# Altium PCB Tablet_Design.PcbDoc (part 1 of 6)
Units mil, origin at the board's own origin, x right, y up, seen from the top; angles counter-clockwise.
Board outline 3823 x 4035 mil, 2 copper layers (Top Layer, Bottom Layer), stack 57 mil thick; 254 components, 256 nets, 1099 pads, 445 vias.
Unrouted connection lines stored in the file: 188.
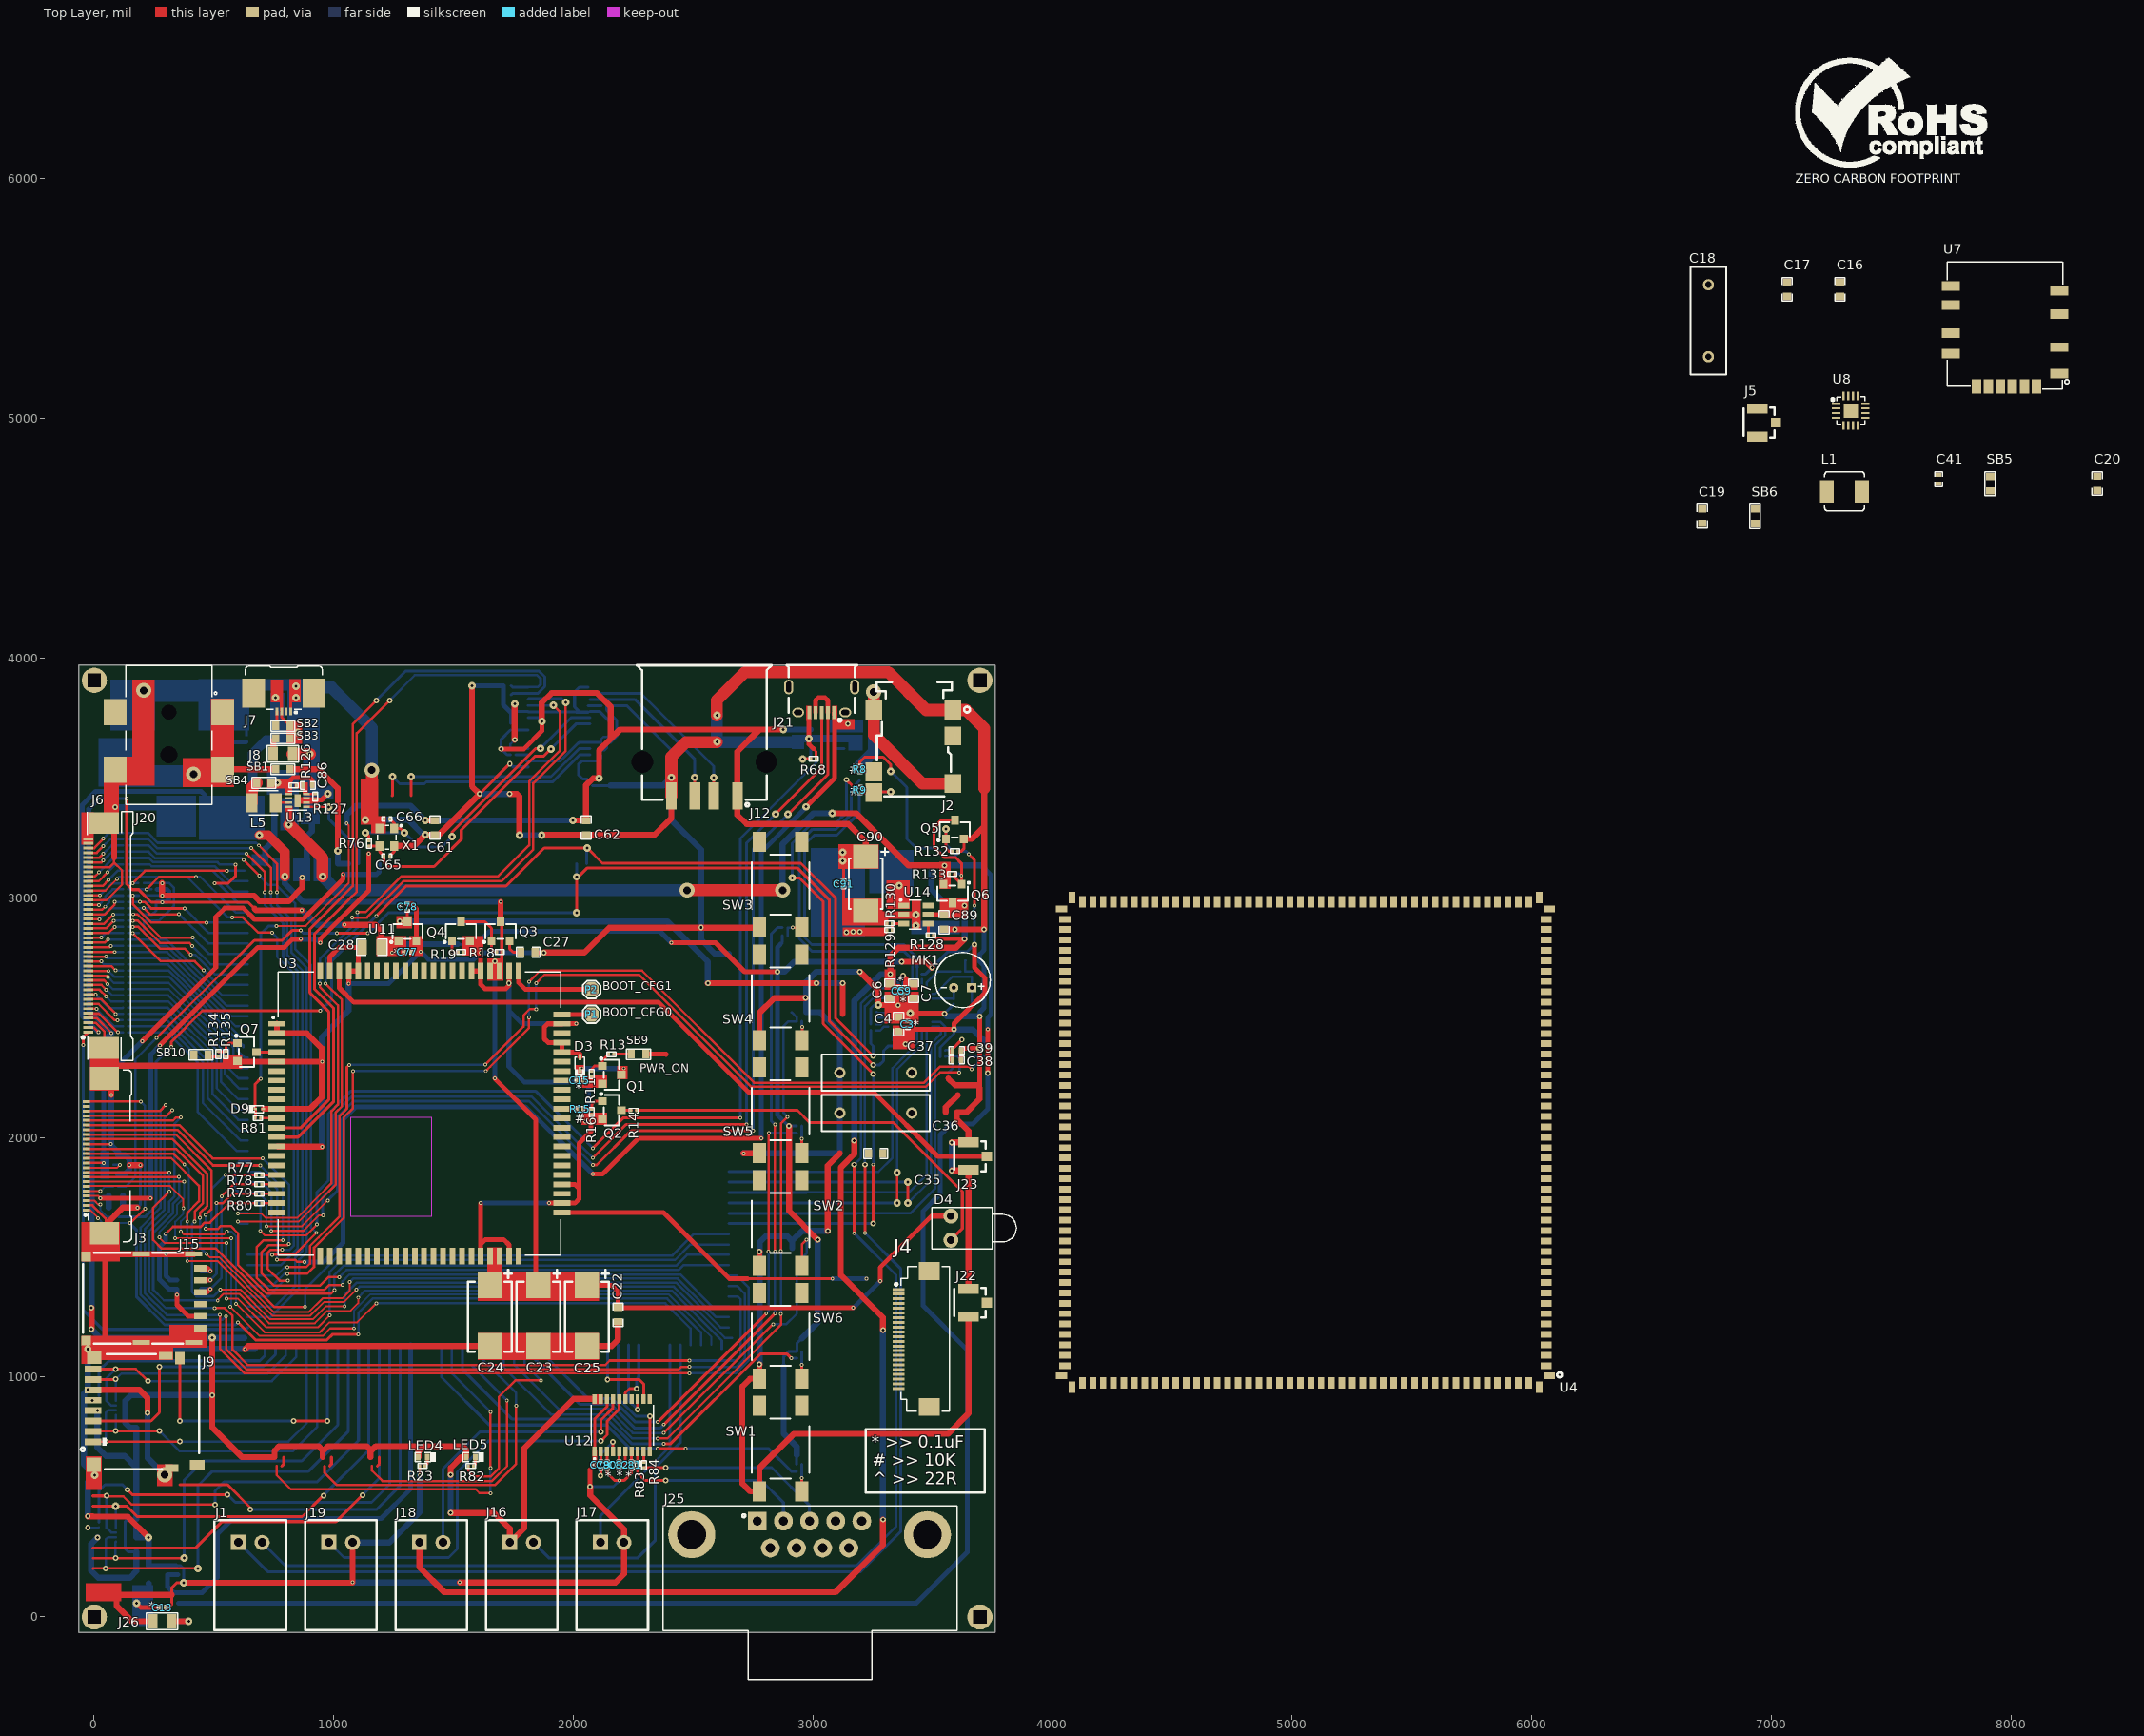
[diagram p0: Top Layer view]
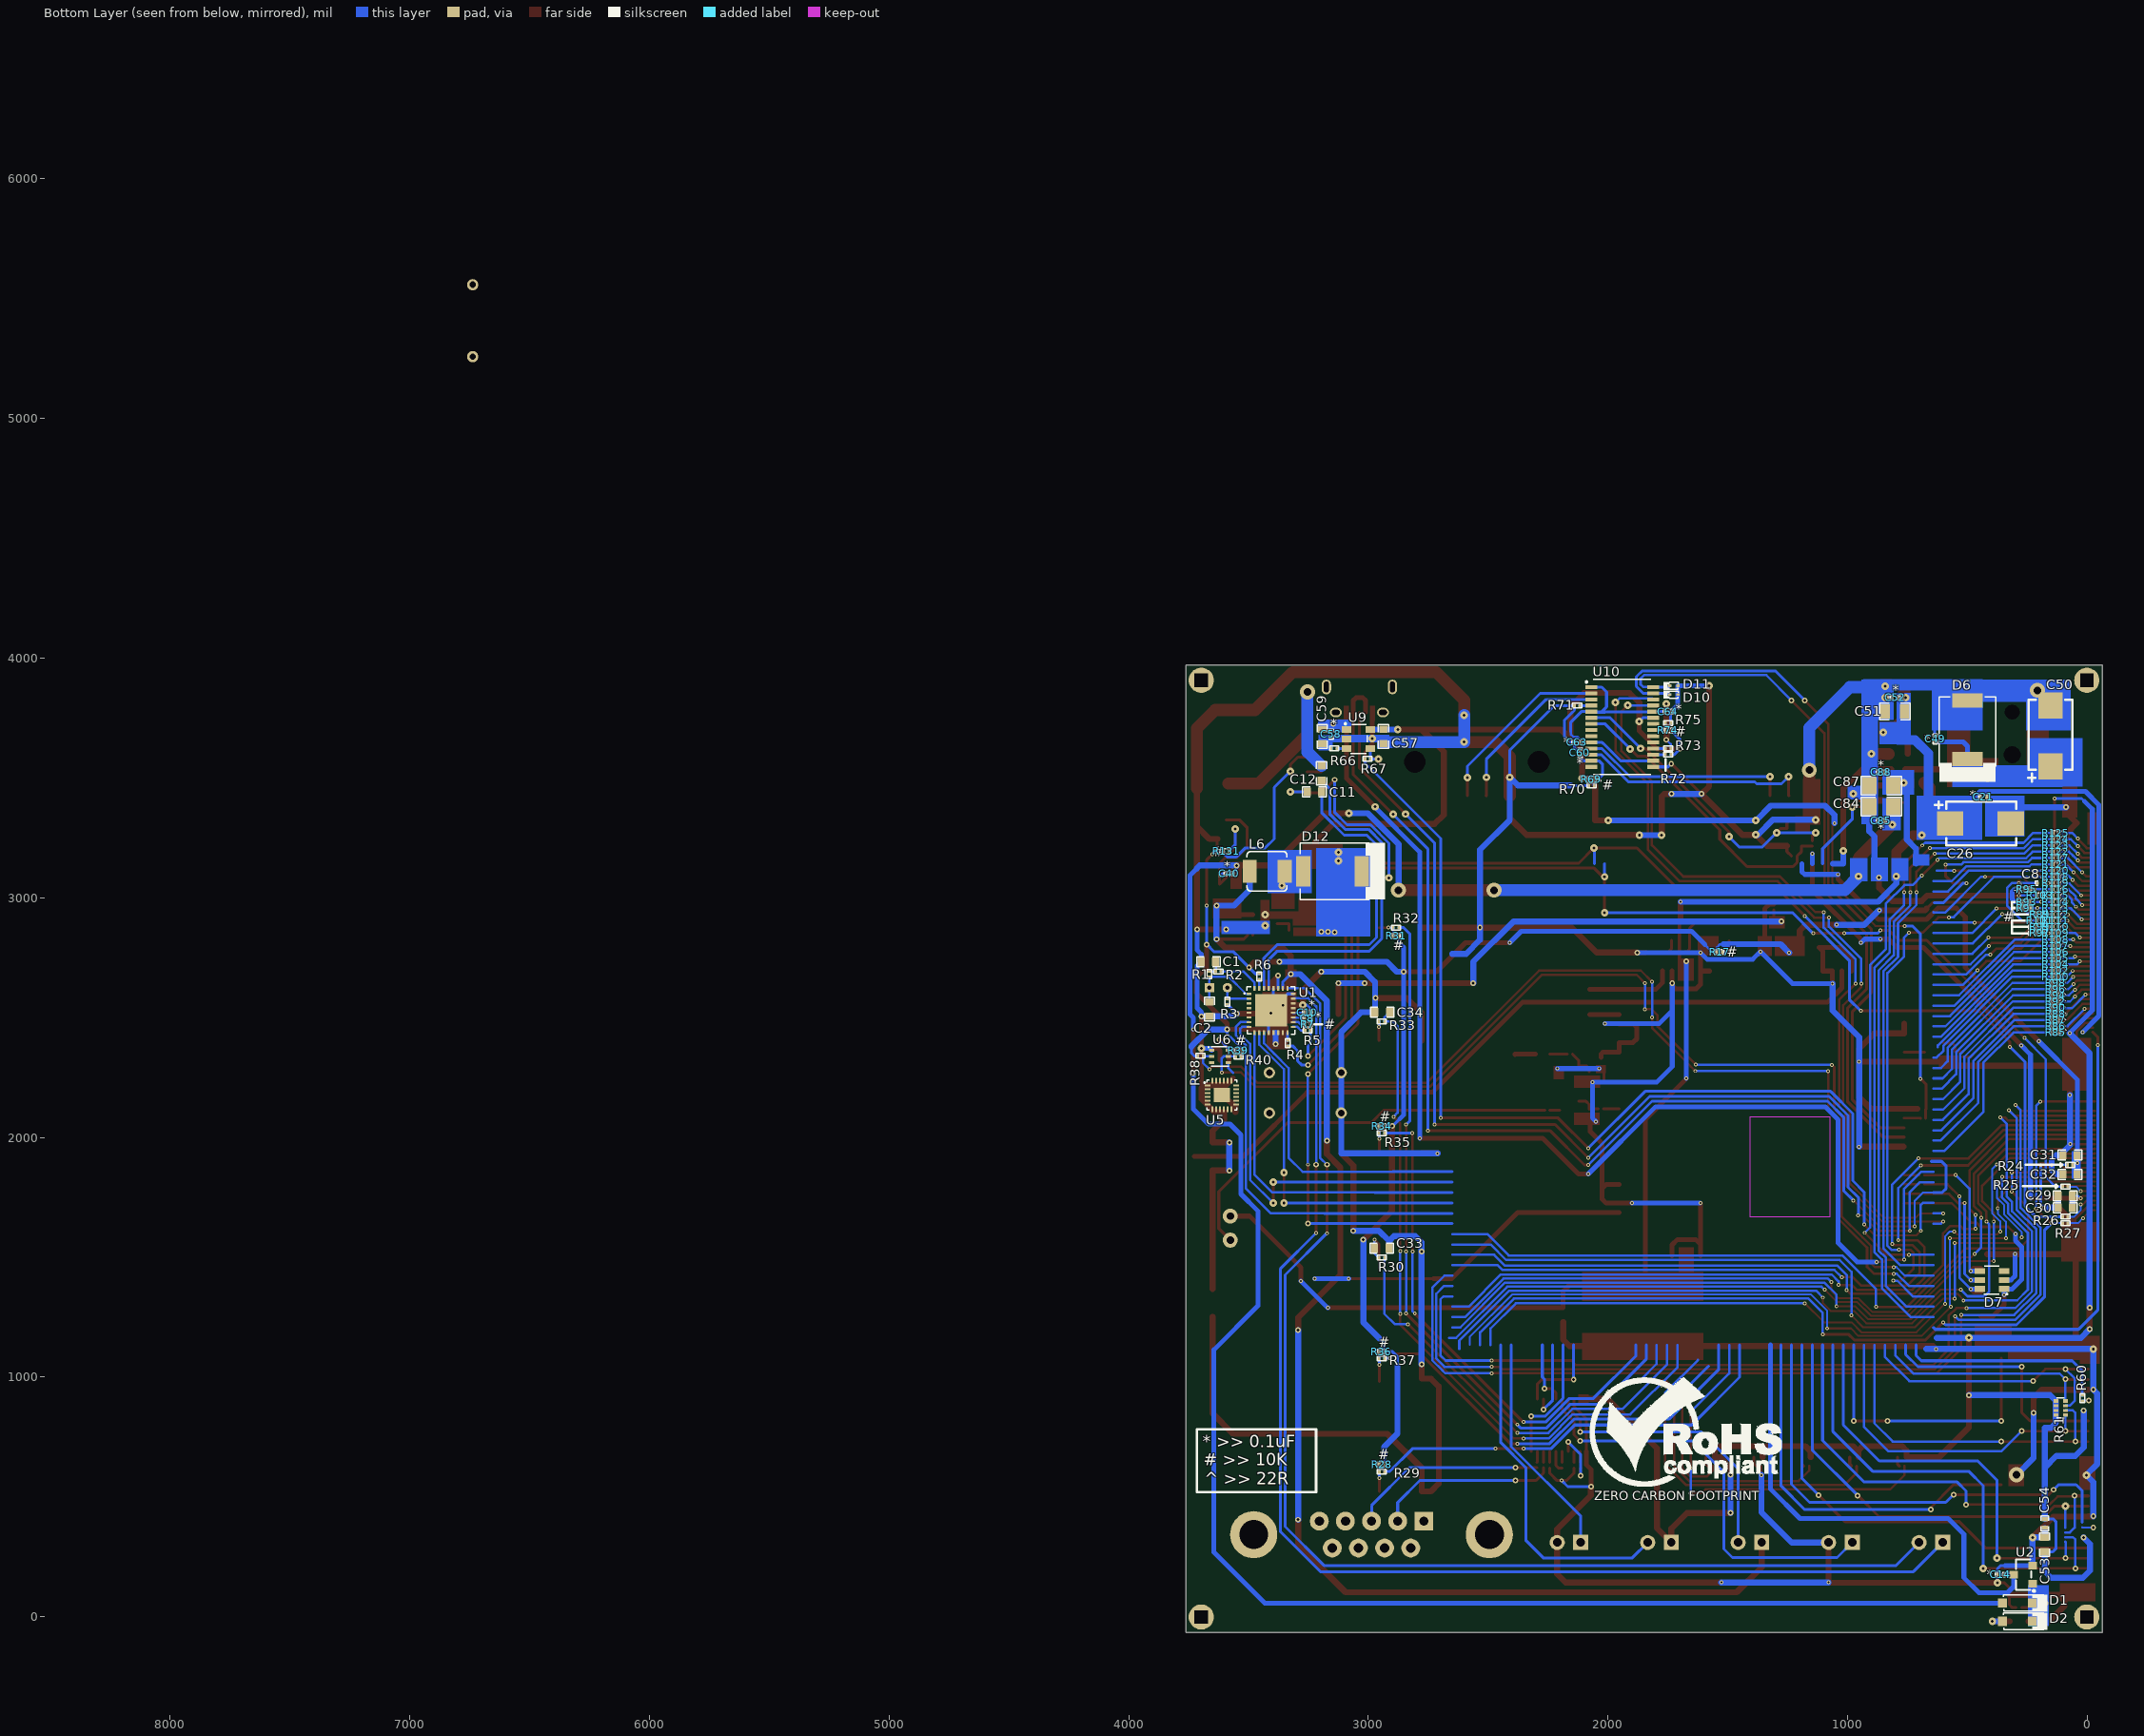
[diagram p1: Bottom Layer view, seen from below]
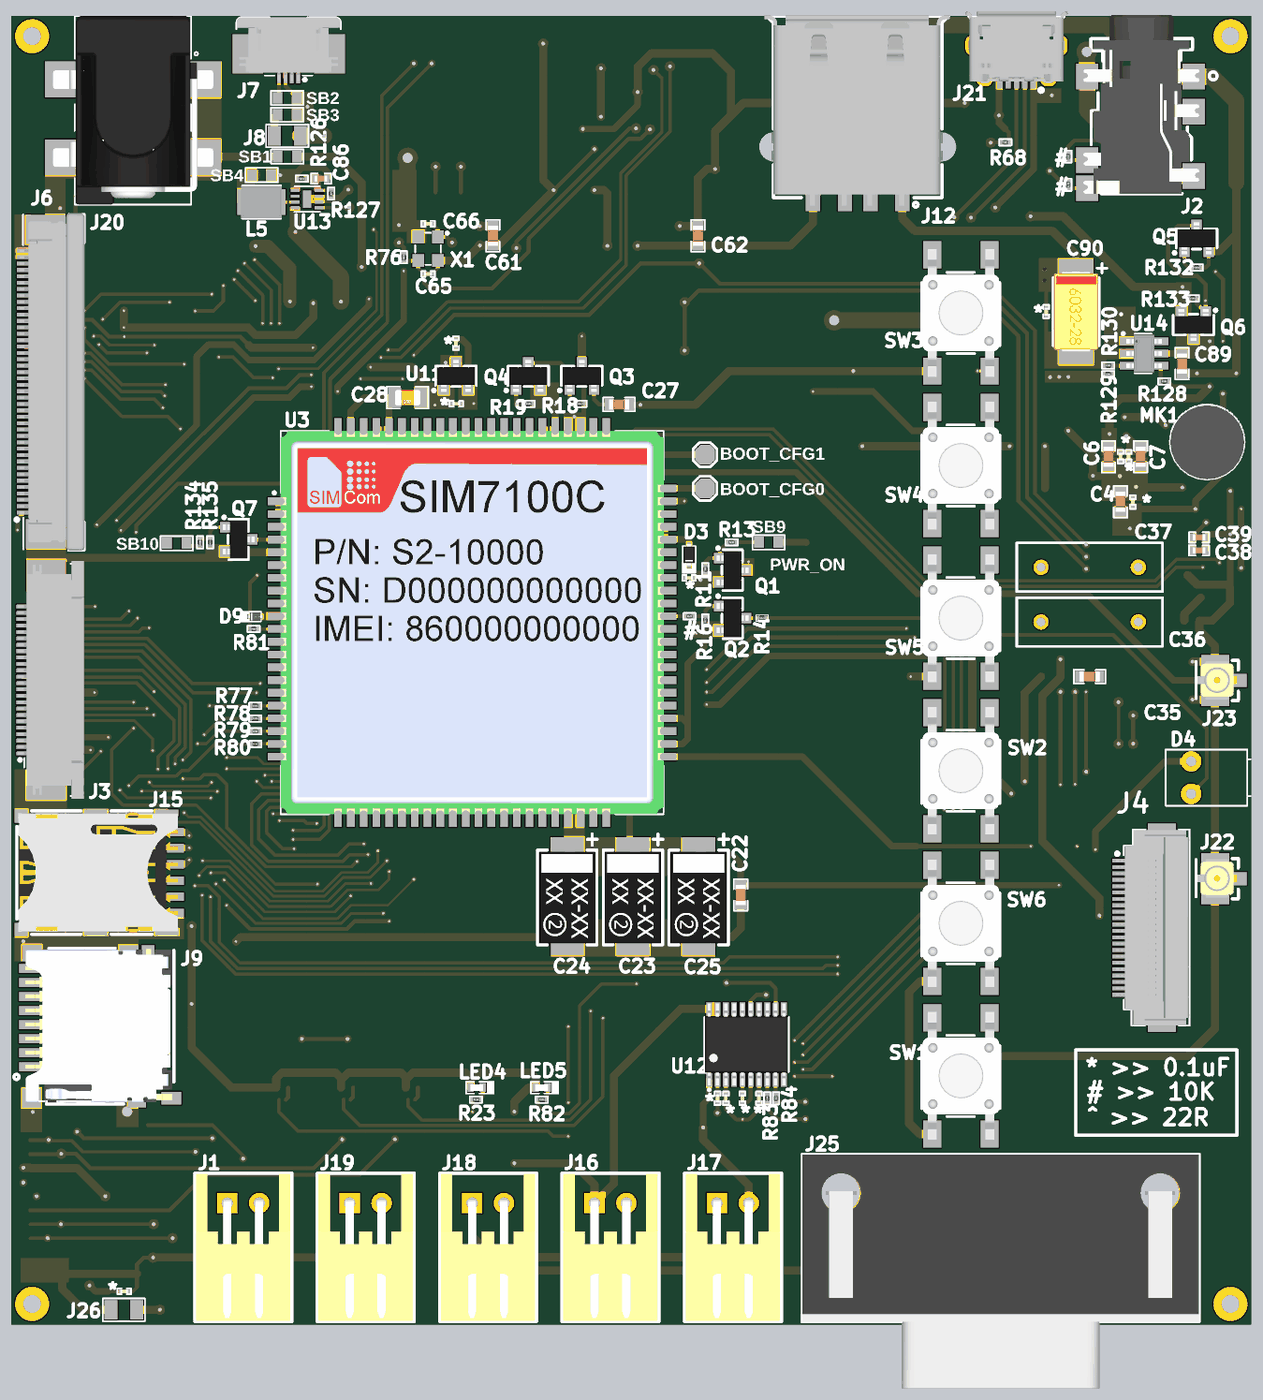
[diagram p4: 3D render of the assembled board from above, using the file's embedded part models]
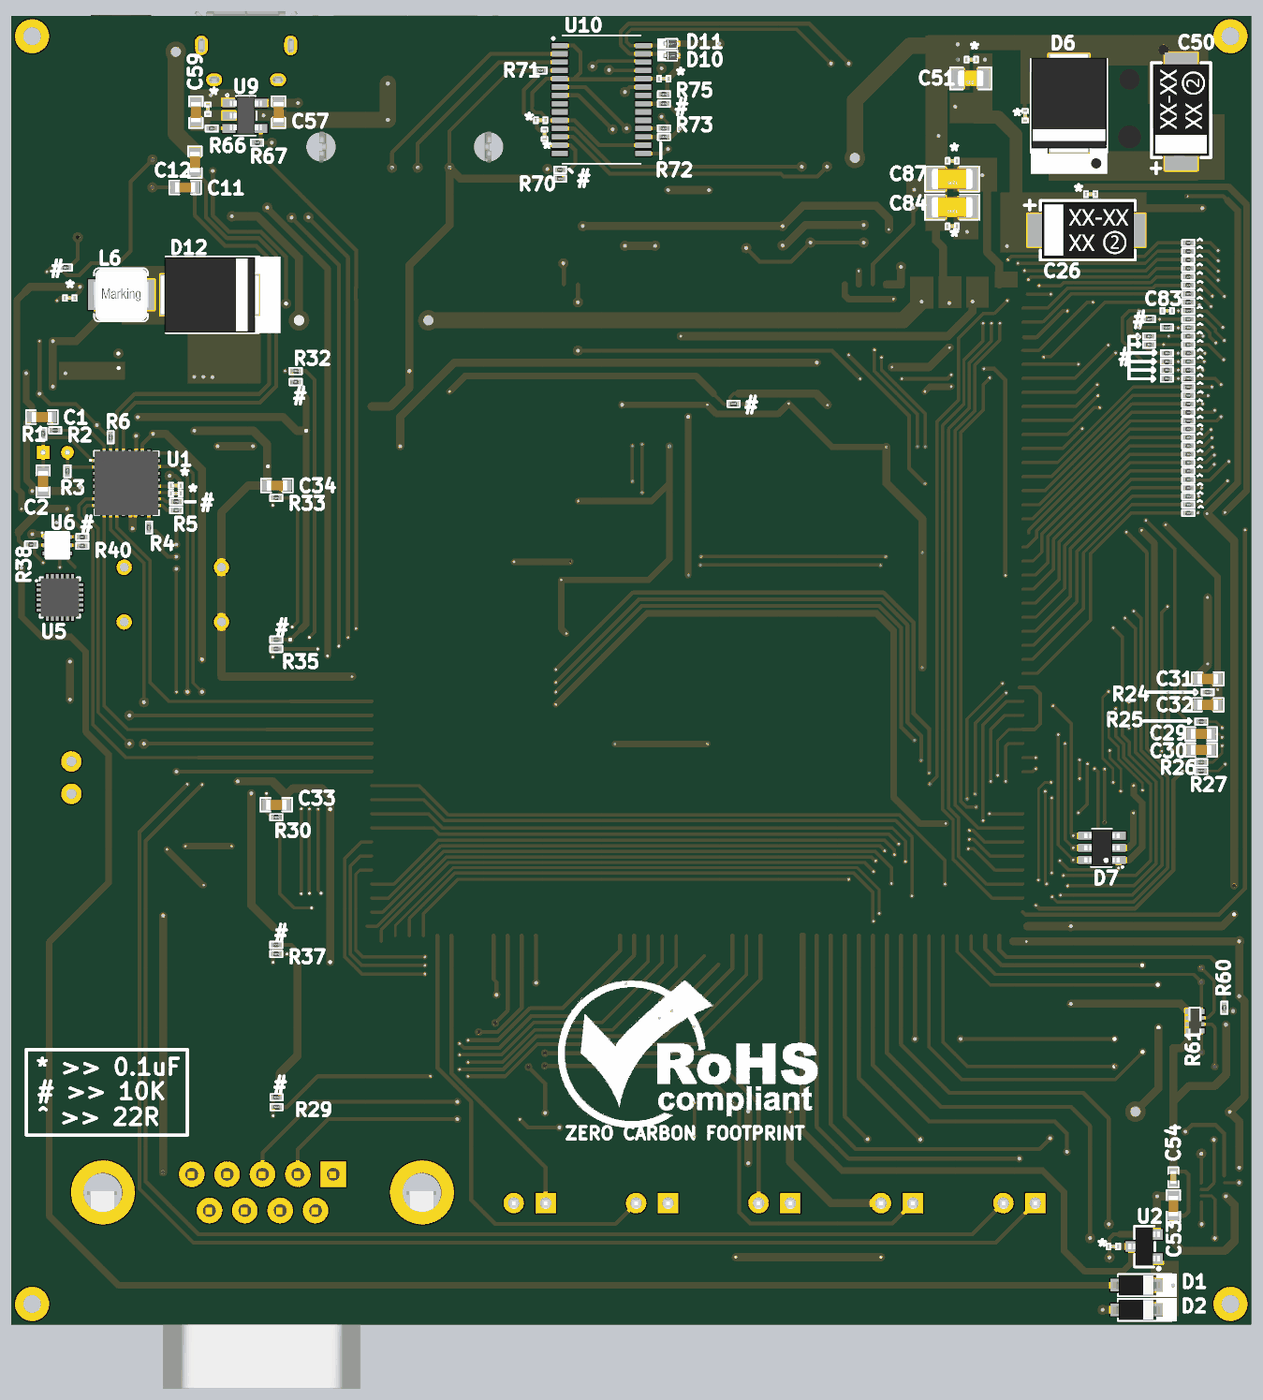
[diagram p5: 3D render of the assembled board from below, using the file's embedded part models]

## Layer stack, top to bottom
Top Solder: solder mask 3, Solder Resist, Dk 3.5
Top Layer: signal copper 10
Dielectric 1: dielectric 37, FR-4, Dk 4.8
Bottom Layer: signal copper 10
Bottom Solder: solder mask 3, Solder Resist, Dk 3.5

## Board outline
-62,-65 3761,-65 3761,3970 -62,3970

## Design rules (kind name [scope] priority, off if disabled: settings)
Clearance [All] p1: gap=7 ignorepadtopadclearanceinfootprint=FALSE except(5: Arc-SMDPad Track-SMDPad SMDPad-SMDPad)
HoleSize [All] p1: absolutevalues=TRUE maxlimit=1000 minlimit=1 maxpercent=80.000 minpercent=20.000
HoleToHoleClearance [All] p1: gap=1 allowstackedmicrovias=TRUE
MinimumSolderMaskSliver [All] p1: minsoldermaskwidth=0
PolygonConnect [All] p1: connectstyle=Relief reliefconductorwidth=10 reliefentries=4 polygonreliefangle="90 Angle" airgapwidth=10
RoutingVias [All] p1: holewidth=7.87 width=15.75 viastyle="Through Hole" minholewidth=7.87 minwidth=15.75 maxholewidth=31.5 maxwidth=62.99
SilkToSilkClearance [All] p1: silktosilkclearance=0
SilkToSolderMaskClearance [IsPad] p1: minsilkscreentomaskgap=0 clearancetoexposedcopper=TRUE
SolderMaskExpansion [All] p1: expansion=4
Width [All] p1: maxlimit=100 minlimit=8 preferedwidth=12 minimp=50.000000 maximp=50.000000 favimp=50.000000
25 further rules are at their usual default settings.

## Classes and differential pairs
component class U_BLE&WiFi_Section: C19 C20 C35 C41 J5 L1 SB5 SB6 U7 U8
component class U_Main_Cont_2: LED5 R82
component class U_USIM_Sec: C21 C22 C23 C24 C25 C26 D7 D9 D10 D11 J15 R77 R78 R79 R80 R81
component class U_USB_OTG: C57 C58 C59 J21 R66 R67 R68 U9
component class U_USB_Host: C60 C61 C62 C63 C64 C65 C66 J12 R69 R70 R71 R72 R73 R74 R75 R76 U10 X1
component class U_USB_Power: C40 C89 C90 C91 D12 L6 Q5 Q6 R128 R129 R130 R131 R132 R133 U14
component class U_Sensor_Section: C18 C36 C37 C38 C39 R38 R39 R40 R48 U5 U6
component class U_RTC_Sec: BT1 C13 C14 D1 D2 J26 U2
component class "U_RS-232 Tranceiver Section": C79 C80 C81 C82 J16 J17 J18 J19 J25 R83 R84 U12
component class U_MIC_Sec: C1 C2 MK1 R1 R2 R3
component class U_Memory_Section: C53 C54 J9 R60 R61
component class U_LCD_Section: C83 J20 R85 R86 R87 R88 R89 R90 R91 R92 R93 R94 R95 R96 R97 R98 R99 R100 R101 R102 R103 R104 R105 R106 R107 R108 R109 R110 R111 R112 R113 R114 R115 R116 R117 R118 R119 R120 R121 R122 R123 R124 R125
component class U_Level_Shifter_Sec: C77 C78 U11
component class U_MCU_Core_Power: C84 C85 C86 C87 C88 L5 R51 R53 R126 R127 SB4 U13
component class U_Main_Cont: C28 J? LED4 R23 R? U4
component class U_Key_Buttons: C33 C34 R28 R29 R30 R31 R32 R33 R34 R35 R36 R37 SW1 SW2 SW3 SW4 SW5 SW6
component class U_Headphones_Sec: C11 C12 J2 R8 R9
component class U_Connector_Section: C49 C50 C51 C52 D6 J6 J7 J8 SB1 SB2 SB3
component class U_Camera_Section: C16 C17 C29 C30 C31 C32 J3 J4 R24 R25 R26 R27
component class U_Audio_Codec_Sec: C3 C4 C5 C6 C7 C8 C9 C10 C? J1 R4 R5 R6 R7 U1
component class U_3G_Modem: C15 C27 D3 D4 J22 J23 P1 P2 Q1 Q2 Q3 Q4 Q7 R11 R13 R14 R15 R16 R17 R18 R19 R134 R135 SB9 SB10 U3

## Components (designator, comment, footprint, x,y, rotation, side; value= is the part's Value field where it differs from the comment)
C1 "4.7uF" Cap0603 3667,2733 r0 bottom locked
C2 "1uF" Cap0603 3663,2535 r270 bottom locked
C3 "0.1uF" "CAP 0201" 3396,2471 r90 top locked
C4 "10uF" Cap0603 3358,2472 r90 top locked
C5 "0.1uF" "CAP 0201" 3358,2611 r270 top locked
C6 "10uF" Cap0603 3321,2611 r270 top locked
C7 "4.7uF" Cap0603 3420,2611 r270 top locked
C8 "0.1uF" "CAP 0201" 3253.87,2497.45 r0 bottom locked
C9 "0.1uF" "CAP 0201" 3383,2611 r270 top locked
C10 "0.1uF" "CAP 0201" 3253.87,2521.79 r0 bottom locked
C11 "4.7uF" Cap0603 3225,3441 r0 bottom locked
C12 "4.7uF" Cap0603 3195,3519 r90 bottom locked
C13 "0.1uF" "CAP 0201" 286,38 r0 top locked
C14 "0.1uF" "CAP 0201" 363,176 r0 bottom locked
C15 "0.1uF" "CAP 0201" 2028,2237 r0 top locked
C16 "1uF" Cap0603 7286,5538 r90 top
C17 "10uF" Cap0603 7066,5538 r90 top
C18 "Cap" RAD-0.3 6737,5407 r90 top value=0.1uF
C19 "1.2pF" Cap0603 6711,4592 r90 top
C20 "1.2pF" Cap0603 8359,4728 r90 top
C21 "0.1uF" "CAP 0201" 433,3420 r180 bottom locked
C22 "1uF" Cap0603 2187,1260 r270 top locked
C23 "100uF" 593D107X9016D2TE3 1854.71,1256.23 r270 top locked
C24 "100uF" 593D107X9016D2TE3 1652,1256.23 r270 top locked
C25 "100uF" 593D107X9016D2TE3 2057.42,1256.23 r270 top locked
C26 "100uF" 593D107X9016D2TE3 446,3309 r180 bottom locked
C27 "10uF" Cap0603 1812,2772 r180 top locked
C28 "22UF" Cap0805 1160,2793.04 r180 top locked
C29 "1uF" Cap0603 92,1756 r0 bottom locked
C30 "10uF" Cap0603 92,1707 r0 bottom locked
C31 "1uF" Cap0603 72,1926 r0 bottom locked
C32 "10uF" Cap0603 72,1846 r0 bottom locked
C33 "1uF" Cap0603 2944,1538 r0 bottom locked
C34 "1uF" Cap0603 2942,2522 r180 bottom locked
C35 "10uF" Cap0603 3263,1933 r0 top locked
C36 "Cap" RAD-0.3 3263,2101.5 r0 top locked value=0.1uF
C37 "Cap" RAD-0.3 3263,2270 r0 top locked value=0.1uF
C38 "100pF" Cap0402 3600.24,2322 r180 top locked
C39 "100pF" Cap0402 3600.24,2362 r180 top locked
C40 "0.1uF" "CAP 0201" 3581,3100 r180 bottom locked
C41 "10nF" Cap0402 7697,4746 r90 top
C49 "0.1uF" "CAP 0201" 635,3662 r90 bottom locked
C50 "100uF" 593D107X9016D2TE3 154,3675 r90 bottom locked
C51 "22UF" Cap0805 802.84,3777.11 r0 bottom locked
C52 "0.1uF" "CAP 0201" 801,3835 r0 bottom locked
C53 "10uF" Cap0603 178,301 r90 bottom locked
C54 "100pF" Cap0402 178,389 r270 bottom locked
C57 "10uF" Cap0603 2937,3673 r270 bottom locked
C58 "0.1uF" "CAP 0201" 3155,3682 r270 bottom locked
C59 "10uF" Cap0603 3192,3673 r270 bottom locked
C60 "0.1uF" "CAP 0201" 2117,3605 r90 bottom locked
C61 "10uF" Cap0603 1423,3292 r270 top locked
C62 "10uF" Cap0603 2055,3292 r270 top locked
C63 "0.1uF" "CAP 0201" 2129,3648 r0 bottom locked
C64 "0.1uF" "CAP 0201" 1749,3775.98 r180 bottom locked
C65 "18pF" "CAP 0201" 1223,3174 r180 top locked
C66 "18pF" "CAP 0201" 1223,3329 r0 top locked
C77 "0.1uF" "CAP 0201" 1310,2774 r0 top locked
C78 "0.1uF" "CAP 0201" 1309,2961 r90 top locked
C79 "0.1uF" "CAP 0201" 2115.43,633 r90 top locked
C80 "0.1uF" "CAP 0201" 2141.19,633 r270 top locked
C81 "0.1uF" "CAP 0201" 2243.39,633 r270 top locked
C82 "0.1uF" "CAP 0201" 2192.2,633 r90 top locked
C83 "10pF" "CAP 0201" 197,3061 r0 bottom locked
C84 "47uF" Cap1206 860,3380 r0 bottom locked
C85 "0.1uF" "CAP 0201" 860,3321 r0 bottom locked
C86 "22pF" Cap0402 893,3468 r180 top locked
C87 "47uF" Cap1206 860,3467 r0 bottom locked
C88 "0.1uF" "CAP 0201" 860,3523 r0 bottom locked
C89 "10uF" Cap0603 3548,2898 r270 top locked
C90 "22uF" T491C226K025AT 3221,3058 r270 top locked
C91 "0.1uF" "CAP 0201" 3129,3058 r270 top locked
D1 "1N4148W-7-F" SOD-123 292,57 r180 bottom locked
D2 "1N4148W-7-F" SOD-123 292,-19 r180 bottom locked
D3 "ESDA18-1K" SOD-523 2028,2308 r90 top locked
D4 "LED1" LED-1 3576,1621.48 r0 top locked
D6 "SS34-E3/57T" SMC 500,3700.76 r90 bottom locked
D7 "ESDA6V1-5SC6" SOT-23-6 398,1405 r0 bottom locked
D9 "ESD9L5.0ST5G" SOD-923 690,2118 r0 top locked
D10 "ESD9L5.0ST5G" SOD-923 1725,3847 r180 bottom locked
D11 "ESD9L5.0ST5G" SOD-923 1725,3884 r180 bottom locked
D12 "SS34-E3/57T" SMC 3149,3110 r0 bottom locked
J1 "S2B-XH-A(LF)(SN)" S2B-XH-A(LF)(SN) 653,310 r0 top locked
J2 "SJ-43504-SMT-TR" SJ-43504-SMT-TR 3419.63,3610.76 r0 top locked
J3 "0524352471" 0524352471 6.94,1923 r90 top locked
J4 "TF31-22S-0.5SH(800)" TF31-22S-0.5SH(800) 3422,1159 r270 top
J5 "U.FL-R-SMT-1(80)" U.FL-R-SMT-1(80) 6982,4982 r90 top
J6 "DC-005-5A-2.5-SMT" DC-005-5A-2.5-SMT 313,3774 r270 top locked value=Custom
J7 "0527460471" 0527460471 793,3815 r180 top locked
J8 "SMD PADS" "SMD PAD" 789,3600 r0 top locked
J9 "114-00841-68" 114-00841-68 214,855 r270 top locked
J12 "87583-2010BLF" 87583-2010BLF 2547.66,3495.53 r180 top locked
J15 "693043020611" 693043020611 205,1329 r270 top locked
J16 "S2B-XH-A(LF)(SN)" S2B-XH-A(LF)(SN) 1785.24,310 r0 top locked
J17 "S2B-XH-A(LF)(SN)" S2B-XH-A(LF)(SN) 2162.65,310 r0 top locked
J18 "S2B-XH-A(LF)(SN)" S2B-XH-A(LF)(SN) 1407.83,310 r0 top locked
J19 "S2B-XH-A(LF)(SN)" S2B-XH-A(LF)(SN) 1030.41,310 r0 top locked
J20 "4-1734592-2" 4-1734592-2 -23,2438.71 r90 top locked
J21 "10118194-0001LF" 10118194-0001LF 3037.2,3772.7 r180 top locked
J22 "U.FL-R-SMT-1(80)" U.FL-R-SMT-1(80) 3690,1310 r90 top locked
J23 "U.FL-R-SMT-1(80)" U.FL-R-SMT-1(80) 3690,1921 r90 top locked
J25 "A-DF 09 A/KG-T4S" "A-DF 09 A/KG-T4S" 2986.58,342.91 r0 top locked
J26 "SMD PADS" "SMD PAD" 285,-19 r180 top locked
L1 "2.2uH" 74437324022 7304,4695 r0 top
L5 "1uH" LQH32PN1R0NNCL 709,3396 r180 top locked
L6 "2.2uH" 74437324022 3422,3110 r0 bottom locked
LED4 "LED Blue" "LED 0402" 1373,666 r0 top locked
LED5 "LED Blue" "LED 0402" 1573,666 r0 top locked
MK1 "POM-2738P-R" POM-2738P-R 3625.4,2624.31 r180 top locked
P1 "Test Point" "TEST POINT" 2077,2513 r0 top locked
P2 "Test Point" "TEST POINT" 2077,2617 r0 top locked
Q1 "MMBT3904" SOT-23 2162,2261 r270 top locked
Q2 "MMBT3904" SOT-23 2162,2113 r270 top locked
Q3 "CJ2305" SOT-23 1697,2860 r0 top locked value=Custom
Q4 "MMBT3904" SOT-23 1532,2860 r0 top locked
Q5 "MMBT3904" SOT-23 3592.67,3284 r0 top locked
Q6 "CJ2305" SOT-23 3583,3017 r180 top locked value=Custom
Q7 "MMBT3904" SOT-23 639,2356 r270 top locked
R1 "680R" Res-0201#1 3663,2681.31 r90 bottom locked
R2 "5.6K" Res-0201#1 3626,2692.31 r0 bottom locked
R3 "680R" Res-0201#1 3588,2566 r270 bottom locked
R4 "100R" Res-0201#1 3336.69,2392.83 r90 bottom locked
R5 "100R" Res-0201#1 3252.87,2445.79 r0 bottom locked
R6 "0R" Res-0201#1 3454.87,2670.79 r90 bottom locked
R7 "10K" Res-0201#1 3252.87,2472.12 r0 bottom locked
R8 "10K" Res-0201#1 3197,3536 r90 top locked
R9 "10K" Res-0201#1 3197,3449 r90 top locked
R11 "47K" Res-0201#1 2078,2264 r270 top locked
R13 "4.7K" Res-0201#1 2159,2347 r0 top locked
R14 "300R" Res-0201#2 2253,2113 r0 top locked
R15 "10K" Res-0201#1 2029,2119 r180 top locked
R16 "47K" Res-0201#1 2078,2106 r270 top locked
R17 "10K" Res-0201#1 1534,2774 r0 bottom
R18 "100K" Res-0201#1 1693,2774 r0 top locked
R19 "5.1K" Res-0201#1 1533,2774 r0 top locked
R23 "470R" Res-0201#1 1370.83,629 r0 top locked
R24 "0R" Res-0201#1 72,1885 r180 bottom locked
R25 "100R" Res-0201#1 92,1794.05 r0 bottom locked
R26 "100R" Res-0201#1 92,1669 r0 bottom locked
R27 "33R" Res-0201#1 92,1642 r0 bottom locked
R28 "10K" Res-0201#1 2943.17,636 r180 bottom locked
R29 "100R" Res-0201#1 2943.17,606 r180 bottom locked
R30 "100R" Res-0201#1 2944,1499 r180 bottom locked
R31 "10K" Res-0201#1 2884,2841 r180 bottom locked
R32 "100R" Res-0201#1 2884,2875 r180 bottom locked
R33 "100R" Res-0201#1 2944,2484 r180 bottom locked
R34 "10K" Res-0201#1 2943.83,2047 r180 bottom locked
R35 "100R" Res-0201#1 2943.83,2018 r180 bottom locked
R36 "10K" Res-0201#1 2944.17,1106 r180 bottom locked
R37 "100R" Res-0201#1 2944,1078 r180 bottom locked
R38 "2.2K" Res-0201#1 3700.24,2340 r0 bottom locked
R39 "10K" Res-0201#1 3542.24,2363 r180 bottom locked
R40 "2.2K" Res-0201#1 3542.24,2336 r180 bottom locked
R60 "100R" Res-0201#1 21,912 r270 bottom locked
R61 "47K" CAY10-473J4LF 131.37,900.68 r180 bottom locked
R66 "6.8K" Res-0201#1 3143,3623 r0 bottom locked
R67 "1K" Res-0201#1 3003,3579 r0 bottom locked
R68 "100K" Res-0201#1 3003,3580 r0 top locked
R69 "10K" Res-0201#1 2068.83,3495 r180 bottom locked
R70 "47K" Res-0201#1 2068.83,3468 r180 bottom locked
R71 "680R" Res-0201#1 2129,3801.57 r180 bottom locked
R72 "510K" Res-0201#1 1749,3596.67 r180 bottom locked
R73 "100K" Res-0201#1 1749,3623 r180 bottom locked
R74 "10K" Res-0201#1 1749,3699.2 r180 bottom locked
R75 "20K" Res-0201#1 1749,3728 r180 bottom locked
R76 "1.1M" Res-0201#1 1148,3226 r270 top locked
R77 "50R" Res-0201#1 690,1843 r0 top locked
R78 "50R" Res-0201#1 690,1804 r0 top locked
R79 "50R" Res-0201#1 690,1764.5 r0 top locked
R80 "50R" Res-0201#1 690,1725 r0 top locked
R81 "0R" Res-0201#1 685,2080 r180 top locked
R82 "470R" Res-0201#1 1573.25,629 r0 top locked
R83 "100R" Res-0201#1 2269,633 r90 top locked
R84 "100R" Res-0201#1 2296,633 r270 top locked
R85 "22R" Res-0201#1 132,2437.14 r0 bottom locked
R86 "22R" Res-0201#1 132,2463.06 r0 bottom locked
R87 "22R" Res-0201#1 132,2488.98 r0 bottom locked
R88 "22R" Res-0201#1 132,2514.91 r0 bottom locked
R89 "10K" Res-0201#1 198,2930 r0 bottom locked
R90 "22R" Res-0201#1 132,2540.83 r0 bottom locked
R91 "10K" Res-0201#1 253,2956 r0 bottom locked
R92 "22R" Res-0201#1 132,2566.76 r0 bottom locked
R93 "10K" Res-0201#1 253,2982 r0 bottom locked
R94 "22R" Res-0201#1 132,2592.68 r0 bottom locked
R95 "10K" Res-0201#1 253,3035 r0 bottom locked
R96 "22R" Res-0201#1 132,2618.56 r0 bottom locked
R97 "10K" Res-0201#1 198,2852 r0 bottom locked
R98 "22R" Res-0201#1 132,2644.43 r0 bottom locked
R99 "10K" Res-0201#1 198,2878 r0 bottom locked
R100 "22R" Res-0201#1 132,2670.31 r0 bottom locked
R101 "10K" Res-0201#1 198,2904 r0 bottom locked
R102 "22R" Res-0201#1 132,2696.18 r0 bottom locked
R103 "10K" Res-0201#1 198,3009 r0 bottom locked
R104 "22R" Res-0201#1 132,2721.74 r0 bottom locked
R105 "22R" Res-0201#1 132,2747.3 r0 bottom locked
R106 "22R" Res-0201#1 132,2773.43 r0 bottom locked
R107 "22R" Res-0201#1 132,2799.57 r0 bottom locked
R108 "22R" Res-0201#1 132,2825.7 r0 bottom locked
R109 "22R" Res-0201#1 132,2851.84 r0 bottom locked
R110 "22R" Res-0201#1 132,2877.97 r0 bottom locked
R111 "22R" Res-0201#1 132,2904.11 r0 bottom locked
R112 "22R" Res-0201#1 132,2930.24 r0 bottom locked
R113 "22R" Res-0201#1 132,2956.38 r0 bottom locked
R114 "22R" Res-0201#1 132,2982.51 r0 bottom locked
R115 "22R" Res-0201#1 132,3008.65 r0 bottom locked
R116 "22R" Res-0201#1 132,3034.78 r0 bottom locked
R117 "100R" Res-0201#1 132,3165.46 r0 bottom locked
R118 "22R" Res-0201#1 132,3087.05 r0 bottom locked
R119 "100R" Res-0201#1 132,3060.92 r0 bottom locked
R120 "22R" Res-0201#1 132,3113.19 r0 bottom locked
R121 "22R" Res-0201#1 132,3139.32 r0 bottom locked
R122 "22R" Res-0201#1 132,3191.59 r0 bottom locked
R123 "22R" Res-0201#1 132,3217.73 r0 bottom locked
R124 "22R" Res-0201#1 132,3243.86 r0 bottom locked
R125 "22R" Res-0201#1 132,3270 r0 bottom locked
R126 "402K" Res-0201#1 833.83,3468 r180 top locked
R127 "270K" Res-0201#1 924,3422 r270 top locked
R128 "100K" Res-0201#1 3493,2843 r0 top locked
R129 "536K" Res-0201#1 3320,2865 r0 top locked
R130 "100K" Res-0201#1 3320,2892 r0 top locked
R131 "10K" Res-0201#1 3592.83,3193.83 r0 bottom locked
R132 "5.1K" Res-0201#1 3592.83,3194 r0 top locked
R133 "100K" Res-0201#1 3581,3099 r180 top locked
R134 "4.7K" Res-0201#1 520,2347 r270 top locked
R135 "47K" Res-0201#1 551,2347 r270 top locked
SB1 "Solder Bridge" "Solder Bridge" 789,3536 r180 top locked
SB2 "Solder Bridge" "Solder Bridge" 789,3717 r180 top locked
SB3 "Solder Bridge" "Solder Bridge" 789,3665 r180 top locked
SB4 "Solder Bridge" "Solder Bridge" 710,3479 r0 top locked
SB5 "Solder Bridge" "Solder Bridge" 7913,4727 r90 top
SB6 "Solder Bridge" "Solder Bridge" 6932,4591 r90 top
SB9 "Solder Bridge" "Solder Bridge" 2273,2347 r180 top locked
SB10 "Solder Bridge" "Solder Bridge" 448,2344 r0 top locked
SW1 "Tactile Switch" TL3301NF160QG/TR 2866,702 r90 top locked value=Custom
SW2 "Tactile Switch" TL3301NF160QG/TR 2866,1642.8 r90 top locked value=Custom
SW3 "Tactile Switch" TL3301NF160QG/TR 2866,3054 r90 top locked value=Custom
SW4 "Tactile Switch" TL3301NF160QG/TR 2866,2583.6 r90 top locked value=Custom
SW5 "Tactile Switch" TL3301NF160QG/TR 2866,2113.2 r90 top locked value=Custom
SW6 "Tactile Switch" TL3301NF160QG/TR 2866,1172.4 r90 top locked value=Custom
U1 "ALC5621" 32-QFN 3405.87,2529.79 r180 bottom locked value=Custom
U2 "S-1206B18-M3T1U" SOT-23 268,176 r90 bottom locked
U3 "SIM7100AS2-10671" SIM7100AS2-10671 1358.8,2099.51 r0 top locked
U4 "S5P4418" S5P4418 5056,1979 r180 top value=Custom
U5 "ICM-20948" "24-QFN (3x3)" 3611.31,2177 r180 bottom locked
U6 "VEML6030-GS15" 6-SMD 3619.24,2338 r180 bottom locked
U7 "F23BUUM13-W2" F23BUUM13-W2 7749,5551.74 r0 top
U8 "PCA9534BS3,118" 16HVQFN 7330.98,5031.47 r0 top
U9 "SY6280AAC" SOT23-5 3041,3662 r180 bottom locked value=Custom
U10 "GL850G" SSOP-28 1941,3712 r180 bottom locked
U11 "S-1206B18-M3T1U" SOT-23 1309,2860 r0 top locked
U12 "SP3222EEY-L/TR" 20-TSSOP 2205,799 r90 top locked
U13 "ETA3451D2I-T" QFN-8 850,3405 r180 top locked value=Custom
U14 "MP3221GJ-Z" TSOT-23-6 3431,2929 r0 top locked
X1 "8Z-12.000MAAJ-T" 8Z-12.000MAAJ-T 1223,3252 r270 top locked

## Footprints (in the part's own frame and the unit in brackets; to place one, negate y for a bottom-side part, rotate by r counter-clockwise, add the part's x,y. Pads: shape width x height; smd on the part's side, far side on the other; paste and mask are expansions set on the pad)
4-1734592-2 [mm] "CONN FPC BOTTOM 42POS 0.50MM R/A"
  rect 0.3x1.1 smd: 1(0,0) 2(0.5,0) 3(1,0) 4(1.5,0) 5(2,0) 6(2.5,0) 7(3,0) 8(3.5,0) 9(4,0) 10(4.5,0) 11(5,0) 12(5.5,0) 13(6,0) 14(6.5,0) 15(7,0) 16(7.5,0) 17(8,0) 18(8.5,0) 19(9,0) 20(9.5,0) 21(10,0) 22(10.5,0) 23(11,0) 24(11.5,0) 25(12,0) 26(12.5,0) 27(13,0) 28(13.5,0) 29(14,0) 30(14.5,0) 31(15,0) 32(15.5,0) 33(16,0) 34(16.5,0) 35(17,0) 36(17.5,0) 37(18,0) 38(18.5,0) 39(19,0) 40(19.5,0) 41(20,0) 42(20.5,0)
  rect 2.3x3.1 smd: MP1(-1.67,-1.7) MP2(22.17,-1.7)
  silkscreen extent -3,-4.75 23.39,0.69, body extent -2.98,-4.76 23.45,0.35, height 2.05
6-SMD [mm]
  rect 0.55x0.3 smd: 1(-0.875,0.65) 2(-0.875,0) 3(-0.875,-0.65) 4(0.875,-0.65) 5(0.875,0) 6(0.875,0.65)
  silkscreen extent -1.23,-1.04 0.91,1.04, body extent -1,-1 1,1, height 0.83
8Z-12.000MAAJ-T [mm]
  rect 1x0.9 smd: 1(-0.925,0.775) 2(0.925,0.775) 3(0.925,-0.775) 4(-0.925,-0.775)
  silkscreen extent -1.29,-1 1.25,1.57
16HVQFN [mm] "IC I/O EXPANDER I2C 8B 16HVQFN"
  rect 0.9x0.24 smd: 1(-1.55,0.75) 2(-1.55,0.25) 3(-1.55,-0.25) 4(-1.55,-0.75) 9(1.55,-0.75) 10(1.55,-0.25) 11(1.55,0.25) 12(1.55,0.75)
  rect 0.24x0.9 smd: 5(-0.75,-1.55) 6(-0.25,-1.55) 7(0.25,-1.55) 8(0.75,-1.55) 13(0.75,1.55) 14(0.25,1.55) 15(-0.25,1.55) 16(-0.75,1.55)
  rect 1.5x1.5 smd: 17(0,0)
  silkscreen extent -2.04,-1.5 1.5,1.5, body extent -1.5,-1.5 1.5,1.5, height 0.9
20-TSSOP [mm]
  rect 1.05x0.45 smd: 1(-2.775,2.925) 2(-2.775,2.275) 3(-2.775,1.625) 4(-2.775,0.975) 5(-2.775,0.325) 6(-2.775,-0.325) 7(-2.775,-0.975) 8(-2.775,-1.625) 9(-2.775,-2.275) 10(-2.775,-2.925) 11(2.775,-2.925) 12(2.775,-2.275) 13(2.775,-1.625) 14(2.775,-0.975) 15(2.775,-0.325) 16(2.775,0.325) 17(2.775,0.975) 18(2.775,1.625) 19(2.775,2.275) 20(2.775,2.925)
  silkscreen extent -3.61,-3.3 2.16,3.3, body extent -3.2,-3.25 3.2,3.25, height 1.2
"24-QFN (3x3)" [mm]
  rect 0.62x0.22 smd: 1(-1.52,1) 2(-1.52,0.6) 3(-1.52,0.2) 4(-1.52,-0.2) 5(-1.52,-0.6) 6(-1.52,-1) 13(1.52,-1) 14(1.52,-0.6) 15(1.52,-0.2) 16(1.52,0.2) 17(1.52,0.6) 18(1.52,1)
  rect 0.22x0.62 smd: 7(-1,-1.52) 8(-0.6,-1.52) 9(-0.2,-1.52) 10(0.2,-1.52) 11(0.6,-1.52) 12(1,-1.52) 19(1,1.52) 20(0.6,1.52) 21(0.2,1.52) 22(-0.2,1.52) 23(-0.6,1.52) 24(-1,1.52)
  rect 1.7x1.54 smd: 25(0,0)
  silkscreen extent -1.9,-1.57 1.57,1.57, body extent -1.5,-1.5 1.5,1.5, height 1.03
32-QFN [mm] "Audio codec"
  rect 0.5x0.23 smd: 1(-2.35,1.75) 2(-2.35,1.25) 3(-2.35,0.75) 4(-2.35,0.25) 5(-2.35,-0.25) 6(-2.35,-0.75) 7(-2.35,-1.25) 8(-2.35,-1.75) 17(2.35,-1.75) 18(2.35,-1.25) 19(2.35,-0.75) 20(2.35,-0.25) 21(2.35,0.25) 22(2.35,0.75) 23(2.35,1.25) 24(2.35,1.75)
  rect 0.23x0.5 smd: 9(-1.75,-2.35) 10(-1.25,-2.35) 11(-0.75,-2.35) 12(-0.25,-2.35) 13(0.25,-2.35) 14(0.75,-2.35) 15(1.25,-2.35) 16(1.75,-2.35) 25(1.75,2.35) 26(1.25,2.35) 27(0.75,2.35) 28(0.25,2.35) 29(-0.25,2.35) 30(-0.75,2.35) 31(-1.25,2.35) 32(-1.75,2.35)
  rect 3.4x3.4 smd: 33(0,0)
  silkscreen extent -2.88,-2.51 2.54,2.51, body extent -2.5,-2.5 2.5,2.5, height 0.9
114-00841-68 [mm]
  rect 0.7x1.75 smd: 1(3.174,-5.526) 2(2.074,-5.526) 3(0.974,-5.526) 4(-0.126,-5.526) 5(-1.226,-5.526) 6(-2.326,-5.526) 7(-3.426,-5.526) 8(-4.526,-5.526)
  rect 1x1.55 smd: "#CD Switch"(5.624,5.526)
  rect 1.3x1 smd: "*CD Switch"(-5.7,3.694)
  rect 1.5x1.5 smd: MP1(5.624,-5.424)
  rect 0.8x1.4 smd: MP2(5.954,2.826)
  rect 0.8x1.5 smd: MP3(-5.954,2.196)
  rect 1.3x1.5 smd: MP4(-5.726,-5.399)
  silkscreen extent -6.11,-6.8 6.08,5.72, body extent -6.05,-5.92 5.97,5.58, height 1.47
593D107X9016D2TE3 [mm]
  rect 2.79x2.57 smd: 1(-3.22,0) 2(3.22,0)
  silkscreen extent -4.85,-2.31 3.81,2.34, body extent -3.49,-2.21 3.7,2.21, height 2.88
87583-2010BLF [mm]
  rect 1.12x2.88 smd: 1(-3.5,1.79) 2(-1,1.79) 3(1,1.79) 4(3.5,1.79)
  rect 0x0 hole 2.3 unplated: MH1(-6.57,-1.79) MH2(6.57,-1.79)
  silkscreen extent -7.14,-12.04 7.14,2.92, body extent -7.2,-12.07 7.3,2.81, height 7.74
10118194-0001LF [mm]
  rect 0.42x1.35 smd: 1(-1.3,0) 2(-0.65,0) 3(0,0) 4(0.65,0) 5(1.3,0)
  oval 1.25x1 hole 0.55 slot 0.85 at 0 deg: MH1(-2.5,0) MH2(2.5,0)
  oval 1x1.55 hole 0.5 slot 1.15 at 90 deg: MH3(-3.5,-2.7) MH4(3.5,-2.7)
  silkscreen extent -3.73,-5 3.72,0.98, body extent -7.67,-5.38 4.02,0.2, height 2.72
0524352471 [mm]
  rect 0.3x0.8 smd: 1(-5.75,0.963) 2(-5.25,0.963) 3(-4.75,0.963) 4(-4.25,0.963) 5(-3.75,0.963) 6(-3.25,0.963) 7(-2.75,0.963) 8(-2.25,0.963) 9(-1.75,0.963) 10(-1.25,0.963) 11(-0.75,0.963) 12(-0.25,0.963) 13(0.25,0.963) 14(0.75,0.963) 15(1.25,0.963) 16(1.75,0.963) 17(2.25,0.963) 18(2.75,0.963) 19(3.25,0.963) 20(3.75,0.963) 21(4.25,0.963) 22(4.75,0.963) 23(5.25,0.963) 24(5.75,0.963)
  rect 2.4x3.05 smd: MP1(-8.2,-0.962) MP2(8.2,-0.962)
  silkscreen extent -9.09,-3.84 9.09,1.16, body extent -9.3,-3.94 9.3,1.26, height 2
0527460471 [mm]
  rect 0.3x0.8 smd: 1(-0.75,0.962) 2(-0.25,0.962) 3(0.25,0.962) 4(0.75,0.962)
  rect 2.4x3.05 smd: MP1(-3.2,-0.962) MP2(3.2,-0.962)
  silkscreen extent -4.09,-3.84 4.09,1.16, body extent -4.05,-3.81 4.05,1.19, height 2
74437324022 [mm]
  rect 1.5x2.4 smd: 1(-1.85,0) 2(1.85,0)
  silkscreen extent -2.08,-2.08 2.13,2.08, body extent -2.22,-2.03 2.22,2.03, height 1.7
693043020611 [mm] "CONN SMART CARD PUSH-PULL"
  rect 0.67x1.32 smd: C1(1.9,6.07) C2(-0.64,6.07) C3(-1.91,6.07) C5(3.17,6.07) C6(0.63,6.07) C7(-3.18,6.07)
  rect 1.05x1.02 smd: MP1(-4.416,-6.019) MP6(4.484,-6.019)
  rect 0.5x1.82 smd: MP2(-4.67,-0.17) MP3(-4.67,5.4) MP4(4.67,5.4) MP5(4.67,-0.17)
  silkscreen extent -4.83,-6.35 4.83,4.24, body extent -4.75,-6.25 4.75,6.25, height 1.2
"A-DF 09 A/KG-T4S" [mm]
  rect 2x2 hole 1: 1(-5.54,1.42)
  round 2 hole 1: 2(-2.77,1.42) 3(0,1.42) 4(2.77,1.42) 5(5.54,1.42) 6(-4.155,-1.42) 7(-1.385,-1.42) 8(1.385,-1.42) 9(4.155,-1.42)
  round 5 hole 3.05: MH1(-12.495,0) MH2(12.495,0)
  silkscreen extent -15.54,-15.37 15.65,3.02, body extent -15.48,-15.33 15.58,2.96, height 12.8
Cap0402 [mil]
  rect 18x25 smd mask+2.36: 1(-18.5,0) 2(18.5,0)
  silkscreen extent -31,-16 31,16, body extent -20,-10 20,10, height 19
Cap0603 [mil]
  rect 30x35 smd mask+2.36: 1(-30,0) 2(30,0)
  silkscreen extent -49,-21 49,21, body extent -32,-16 31,16, height 34
Cap0805 [mil] "SMD 0805"
  rect 40x60 smd mask+2.76: 1(-40,0) 2(40,0)
  silkscreen extent -64,-34 64,34, body extent -39,-25 39,25, height 30
Cap1206 [mil] "SMD 1206"
  rect 60x70 smd: 1(-50,0) 2(50,0)
  silkscreen extent -84,-39 84,39, body extent -63,-31 63,32, height 39
"CAP 0201" [mm]
  rect 0.3x0.3 smd mask+0.055: 1(-0.3,0) 2(0.3,0)
  silkscreen extent -0.53,-0.23 0.53,0.23, body extent -0.3,-0.15 0.3,0.15, height 0.28
CAY10-473J4LF [mm] "RES ARRAY 4 RES 47K OHM 0804"
  rect 0.5x0.4 smd: 1(0,0) 4(0,-1.5) 5(1,-1.5) 8(1,0)
  rect 0.5x0.3 smd: 2(0,-0.5) 3(0,-1) 6(1,-1) 7(1,-0.5)
  silkscreen extent 0.08,-1.8 0.92,0.3, body extent 0,-1.74 1.02,0.27, height 0.36
DC-005-5A-2.5-SMT [mm]
  rect 2.8x2.4 smd: 1(0,5.7) 1(6.1,5.7) 2(0,-5.7) 3(6.1,-5.7)
  round 0 hole 1.6 unplated: MH1(0,0)
  round 0 hole 1.8 unplated: MH2(4.5,0)
  silkscreen extent -4.95,-4.56 9.8,5.09, body extent -4.99,-6.27 9.81,6.33, height 11.17
F23BUUM13-W2 [mm] "Wifi+BLE module"
  rect 1.9x1 smd: 1(11.49,-9.28) 2(11.49,-6.48) 3(11.49,-2.98) 4(11.49,-0.5) 5(0,0) 6(0,-2) 7(0,-4.98) 8(0,-7.14)
  rect 1x1.5 smd: 9(2.7,-10.65) 10(3.97,-10.65) 11(5.24,-10.65) 12(6.51,-10.65) 13(7.78,-10.65) 14(9.05,-10.65)
  silkscreen extent -0.41,-10.92 12.52,2.55
"LED 0402" [mm] "LED BLUE CLEAR CHIP SMD"
  rect 0.5x0.7 smd: 1(-0.47,0) 2(0.47,0)
  silkscreen extent -0.84,-0.51 1.37,0.51, body extent -0.5,-0.25 0.5,0.25, height 0.5
LED-1 [mm] "LED; 2 Leads"
  round 1.6 hole 0.8: 1(0,1.27) 2(0,-1.27)
  silkscreen extent -2,-2.2 6.95,2.2
LQH32PN1R0NNCL [mm]
  rect 1.25x2 smd: 1(-1.275,0) 2(1.275,0)
  silkscreen extent -1.55,-1.3 1.52,1.3, body extent -1.6,-1.25 1.6,1.25, height 1.7
POM-2738P-R [mm]
  rect 1x1 hole 0.45: 1(-0.95,0)
  round 1 hole 0.45: 2(0.95,0)
  silkscreen extent -2.92,-3.73 2.92,2.11, body extent -3,-3.79 3,2.21, height 2.9
QFN-8 [mm]
  rect 0.7x0.25 smd: 1(-0.925,0.675) 2(-0.925,0.225) 3(-0.925,-0.225) 4(-0.925,-0.675) 5(0.925,-0.675) 6(0.925,-0.225) 7(0.925,0.225) 8(0.925,0.675)
  rect 0.64x1.37 smd: 9(0,0)
  silkscreen extent -1,-1 1,1
RAD-0.3 [mm] "Radial Cap, Thru-Hole; 2 Leads; 0.3 in Pin Spacing"
  round 1.2 hole 0.7: 1(-3.81,0) 2(3.81,0)
  silkscreen extent -5.71,-1.91 5.71,1.91
Res-0201#1 [mm]
  rect 0.27x0.37 smd: 1(-0.275,0) 2(0.275,0)
  silkscreen extent -0.48,-0.25 0.48,0.25, body extent -0.3,-0.15 0.3,0.15, height 0.29
Res-0201#2 [mm]
  rect 0.27x0.37 smd mask+0.06: 1(-0.275,0) 2(0.275,0)
  silkscreen extent -0.47,-0.25 0.47,0.25, body extent -0.3,-0.15 0.3,0.15, height 0.29
S2B-XH-A(LF)(SN) [mm]
  rect 1.6x1.6 hole 0.9: 1(-1.25,0)
  round 1.6 hole 0.9: 2(1.25,0)
  silkscreen extent -3.78,-9.27 3.81,2.34, body extent -3.7,-9.21 3.7,2.29, height 6.15
S5P4418 [mm]
  rect 1.2x0.7 smd: 1(-25.856,24.75) 2(-25.5,23.65) 3(-25.5,22.55) 4(-25.5,21.45) 5(-25.5,20.35) 6(-25.5,19.25) 7(-25.5,18.15) 8(-25.5,17.05) 9(-25.5,15.95) 10(-25.5,14.85) 11(-25.5,13.75) 12(-25.5,12.65) 13(-25.5,11.55) 14(-25.5,10.45) 15(-25.5,9.35) 16(-25.5,8.25) 17(-25.5,7.15) 18(-25.5,6.05) 19(-25.5,4.95) 20(-25.5,3.85) 21(-25.5,2.75) 22(-25.5,1.65) 23(-25.5,0.55) 24(-25.5,-0.55) 25(-25.5,-1.65) 26(-25.5,-2.75) 27(-25.5,-3.85) 28(-25.5,-4.95) 29(-25.5,-6.05) 30(-25.5,-7.15) 31(-25.5,-8.25) 32(-25.5,-9.35) 33(-25.5,-10.45) 34(-25.5,-11.55) 35(-25.5,-12.65) 36(-25.5,-13.75) 37(-25.5,-14.85) 38(-25.5,-15.95) 39(-25.5,-17.05) 40(-25.5,-18.15) 41(-25.5,-19.25) 42(-25.5,-20.35) 43(-25.5,-21.45) 44(-25.5,-22.55) 45(-25.5,-23.65) 46(-25.856,-24.75) 93(25.856,-24.75) 94(25.5,-23.65) 95(25.5,-22.55) 96(25.5,-21.45) 97(25.5,-20.35) 98(25.5,-19.25) 99(25.5,-18.15) 100(25.5,-17.05) 101(25.5,-15.95) 102(25.5,-14.85) 103(25.5,-13.75) 104(25.5,-12.65) 105(25.5,-11.55) 106(25.5,-10.45) 107(25.5,-9.35) 108(25.5,-8.25) 109(25.5,-7.15) 110(25.5,-6.05) 111(25.5,-4.95) 112(25.5,-3.85) 113(25.5,-2.75) 114(25.5,-1.65) 115(25.5,-0.55) 116(25.5,0.55) 117(25.5,1.65) 118(25.5,2.75) 119(25.5,3.85) 120(25.5,4.95) 121(25.5,6.05) 122(25.5,7.15) 123(25.5,8.25) 124(25.5,9.35) 125(25.5,10.45) 126(25.5,11.55) 127(25.5,12.65) 128(25.5,13.75) 129(25.5,14.85) 130(25.5,15.95) 131(25.5,17.05) 132(25.5,18.15) 133(25.5,19.25) 134(25.5,20.35) 135(25.5,21.45) 136(25.5,22.55) 137(25.5,23.65) 138(25.856,24.75)
  rect 0.7x1.2 smd: 47(-24.75,-25.932) 48(-23.65,-25.5) 49(-22.55,-25.5) 50(-21.45,-25.5) 51(-20.35,-25.5) 52(-19.25,-25.5) 53(-18.15,-25.5) 54(-17.05,-25.5) 55(-15.95,-25.5) 56(-14.85,-25.5) 57(-13.75,-25.5) 58(-12.65,-25.5) 59(-11.55,-25.5) 60(-10.45,-25.5) 61(-9.35,-25.5) 62(-8.25,-25.5) 63(-7.15,-25.5) 64(-6.05,-25.5) 65(-4.95,-25.5) 66(-3.85,-25.5) 67(-2.75,-25.5) 68(-1.65,-25.5) 69(-0.55,-25.5) 70(0.55,-25.5) 71(1.65,-25.5) 72(2.75,-25.5) 73(3.85,-25.5) 74(4.95,-25.5) 75(6.05,-25.5) 76(7.15,-25.5) 77(8.25,-25.5) 78(9.35,-25.5) 79(10.45,-25.5) 80(11.55,-25.5) 81(12.65,-25.5) 82(13.75,-25.5) 83(14.85,-25.5) 84(15.95,-25.5) 85(17.05,-25.5) 86(18.15,-25.5) 87(19.25,-25.5) 88(20.35,-25.5) 89(21.45,-25.5) 90(22.55,-25.5) 91(23.65,-25.5) 92(24.75,-25.932) 139(24.75,25.932) 140(23.65,25.5) 141(22.55,25.5) 142(21.45,25.5) 143(20.35,25.5) 144(19.25,25.5) 145(18.15,25.5) 146(17.05,25.5) 147(15.95,25.5) 148(14.85,25.5) 149(13.75,25.5) 150(12.65,25.5) 151(11.55,25.5) 152(10.45,25.5) 153(9.35,25.5) 154(8.25,25.5) 155(7.15,25.5) 156(6.05,25.5) 157(4.95,25.5) 158(3.85,25.5) 159(2.75,25.5) 160(1.65,25.5) 161(0.55,25.5) 162(-0.55,25.5) 163(-1.65,25.5) 164(-2.75,25.5) 165(-3.85,25.5) 166(-4.95,25.5) 167(-6.05,25.5) 168(-7.15,25.5) 169(-8.25,25.5) 170(-9.35,25.5) 171(-10.45,25.5) 172(-11.55,25.5) 173(-12.65,25.5) 174(-13.75,25.5) 175(-14.85,25.5) 176(-15.95,25.5) 177(-17.05,25.5) 178(-18.15,25.5) 179(-19.25,25.5) 180(-20.35,25.5) 181(-21.45,25.5) 182(-22.55,25.5) 183(-23.65,25.5) 184(-24.75,25.932)
  silkscreen extent -27.18,24.39 -26.67,24.89, body extent -26.4,-26.4 26.4,26.4, height 2.54
SIM7100AS2-10671 [mm]
  rect 1.8x0.6 smd: 1(-15.1,9.5) 2(-15.1,8.5) 3(-15.1,7.5) 4(-15.1,6.5) 5(-15.1,5.5) 6(-15.1,4.5) 7(-15.1,3.5) 8(-15.1,2.5) 9(-15.1,1.5) 10(-15.1,0.5) 11(-15.1,-0.5) 12(-15.1,-1.5) 13(-15.1,-2.5) 14(-15.1,-3.5) 15(-15.1,-4.5) 16(-15.1,-5.5) 17(-15.1,-6.5) 18(-15.1,-7.5) 19(-15.1,-8.5) 20(-15.1,-9.5) 41(15.1,-9.5) 42(15.1,-8.5) 43(15.1,-7.5) 44(15.1,-6.5) 45(15.1,-5.5) 46(15.1,-4.5) 47(15.1,-3.5) 48(15.1,-2.5) 49(15.1,-1.5) 50(15.1,-0.5) 51(15.1,0.5) 52(15.1,1.5) 53(15.1,2.5) 54(15.1,3.5) 55(15.1,4.5) 56(15.1,5.5) 57(15.1,6.5) 58(15.1,7.5) 59(15.1,8.5) 60(15.1,9.5) 81(-15.1,-10.5) 82(15.1,-10.5) 85(15.1,10.5)
  rect 0.6x1.8 smd: 21(-9.5,-15.1) 22(-8.5,-15.1) 23(-7.5,-15.1) 24(-6.5,-15.1) 25(-5.5,-15.1) 26(-4.5,-15.1) 27(-3.5,-15.1) 28(-2.5,-15.1) 29(-1.5,-15.1) 30(-0.5,-15.1) 31(0.5,-15.1) 32(1.5,-15.1) 33(2.5,-15.1) 34(3.5,-15.1) 35(4.5,-15.1) 36(5.5,-15.1) 37(6.5,-15.1) 38(7.5,-15.1) 39(8.5,-15.1) 40(9.5,-15.1) 61(9.5,15.1) 62(8.5,15.1) 63(7.5,15.1) 64(6.5,15.1) 65(5.5,15.1) 66(4.5,15.1) 67(3.5,15.1) 68(2.5,15.1) 69(1.5,15.1) 70(0.5,15.1) 71(-0.5,15.1) 72(-1.5,15.1) 73(-2.5,15.1) 74(-3.5,15.1) 75(-4.5,15.1) 76(-5.5,15.1) 77(-6.5,15.1) 78(-7.5,15.1) 79(-8.5,15.1) 80(-9.5,15.1) 83(10.5,-15.1) 84(-10.5,-15.1) 86(-10.5,15.1) 87(10.5,15.1)
  Keep-Out Layer region: 1.25,-10.9 -7.25,-10.9 -7.25,-0.4 1.25,-0.4
  Keep-Out Layer region: 1.25,-10.9 -7.25,-10.9 -7.25,-0.4 1.25,-0.4
  silkscreen extent -15.59,-15 15,15, body extent -15,-15 15,15, height 3.17
SJ-43504-SMT-TR [mm] "CONN JACK 4COND 3.5MM SMD R/A"
  rect 1.75x2 smd: 1(4.175,4.375) 2(-4.175,-2.175) 3(4.175,1.625) 4(-4.175,4.375) 5(-4.175,-4.375) 6(4.175,-3.425)
  silkscreen extent -3.89,-4.8 6,7.34, body extent -4.47,-4.8 4.63,9.2, height 4.15
SMC [mm]
  rect 1.52x3.2 smd: 1(-3.105,0) 2(3.105,0)
  silkscreen extent -5.54,-3 3.45,3, body extent -3.9,-2.95 3.9,2.95, height 2.42
"SMD PAD" [mil] "SMD 0805"
  rect 40x60 smd: 1(-40,0) 2(40,0)
  silkscreen extent -65,-35 65,35
SOD-123 [mm]
  rect 0.92x0.97 smd: 1(-1.575,0) 2(1.575,0)
  silkscreen extent -1.47,-0.91 3.17,0.91, body extent -1.85,-0.8 1.85,0.8, height 1.27
SOD-523 [mm]
  rect 0.65x0.3 smd: 1(-0.675,0) 2(0.675,0)
  silkscreen extent -1.45,-0.56 0.69,0.56, body extent -0.85,-0.45 0.85,0.45, height 0.7
SOD-923 [mm]
  rect 0.36x0.27 smd: 1(-0.42,0) 2(0.42,0)
  silkscreen extent -1.12,-0.43 0.46,0.43, body extent -0.52,-0.32 0.53,0.32, height 0.43
"Solder Bridge" [mil] "Solder Bridge ON"
  rect 30x35 smd: 1(-30,0) 2(30,0)
  silkscreen extent -50,-22 50,22
SOT23-5 [mil] "SOT23-5 Package"
  rect 40x27 smd: 1(-49.21,39.37) 2(-49.21,0) 3(-49.21,-39.37) 4(49.21,-39.37) 5(49.21,39.37)
  silkscreen extent -58,-61 36,68, body extent -46,-58 53,60, height 43
SOT-23 [mm] "TRANS NPN 40V 0.6A SOT23"
  rect 0.82x0.92 smd: 1(-0.95,-1) 2(0.95,-1) 3(0,1)
  silkscreen extent -1.82,-1.23 1.6,0.76, body extent -1.5,-1.25 1.5,1.25, height 1.05
SOT-23-6 [mm] "IC BAT CHG LI-ION 1 CELL SOT23-6"
  rect 1.12x0.62 smd: 1(-1.3,0.95) 2(-1.3,0) 3(-1.3,-0.95) 4(1.3,-0.95) 5(1.3,0) 6(1.3,0.95)
  silkscreen extent -1.68,-1.5 0.86,1.57, body extent -1.4,-1.45 1.4,1.45, height 1.44
SSOP-28 [mm]
  rect 1.25x0.42 smd: 1(-3.275,4.225) 2(-3.275,3.575) 3(-3.275,2.925) 4(-3.275,2.275) 5(-3.275,1.625) 6(-3.275,0.975) 7(-3.275,0.325) 8(-3.275,-0.325) 9(-3.275,-0.975) 10(-3.275,-1.625) 11(-3.275,-2.275) 12(-3.275,-2.925) 13(-3.275,-3.575) 14(-3.275,-4.225) 15(3.275,-4.225) 16(3.275,-3.575) 17(3.275,-2.925) 18(3.275,-2.275) 19(3.275,-1.625) 20(3.275,-0.975) 21(3.275,-0.325) 22(3.275,0.325) 23(3.275,0.975) 24(3.275,1.625) 25(3.275,2.275) 26(3.275,2.925) 27(3.275,3.575) 28(3.275,4.225)
  silkscreen extent -3.84,-5.03 3.05,5.03
T491C226K025AT [mm]
  rect 2.5x2.7 smd: 1(-2.87,0) 2(2.87,0)
  silkscreen extent -3.78,-1.8 2.67,2.41, body extent -3.15,-1.75 3.15,1.75, height 2.8
"TEST POINT" [mil]
  oct 60x60 smd: 1(0,0)
  silkscreen extent -37,-37 37,37
TF31-22S-0.5SH(800) [mm] "CONN FFC 22POS 0.50MM SMD"
  rect 0.3x1.3 smd: 1(-5.25,-1.625) 2(-4.75,-1.625) 3(-4.25,-1.625) 4(-3.75,-1.625) 5(-3.25,-1.625) 6(-2.75,-1.625) 7(-2.25,-1.625) 8(-1.75,-1.625) 9(-1.25,-1.625) 10(-0.75,-1.625) 11(-0.25,-1.625) 12(0.25,-1.625) 13(0.75,-1.625) 14(1.25,-1.625) 15(1.75,-1.625) 16(2.25,-1.625) 17(2.75,-1.625) 18(3.25,-1.625) 19(3.75,-1.625) 20(4.25,-1.625) 21(4.75,-1.625) 22(5.25,-1.625)
  rect 1.9x2.2 smd: MP1(7.2,1.625) MP2(-7.2,1.625)
  silkscreen extent -7.7,-2.01 7.67,3.78, body extent -7.65,-1.97 7.65,3.78, height 1.97
TL3301NF160QG/TR [mm] "Tactile Switch SPST-NO Top Actuated Surface Mount"
  rect 2.12x1.42 smd: 1(-4.55,2.25) 2(4.55,2.25) 3(-4.55,-2.25) 4(4.55,-2.25)
  silkscreen extent -3.17,-3.05 3.17,3.07, body extent -5,-3 5,3, height 4.41
TSOT-23-6 [mm]
  rect 1.2x0.6 smd: 1(-1.3,0.95) 2(-1.3,0) 3(-1.3,-0.95) 3(-1.3,-0.95) 4(1.3,-0.95) 5(1.3,0) 6(1.3,0.95)
  silkscreen extent -1.73,-1.55 0.58,1.63, body extent -1.4,-1.5 1.4,1.5, height 0.86
U.FL-R-SMT-1(80) [mm]
  rect 1.02x1.07 smd: 1(0,-0.923)
  rect 1.07x2.2 smd: 2(1.475,1.025) 3(-1.475,1.025)
  silkscreen extent -1.57,-0.79 1.57,2.51, body extent -1.47,-0.69 1.53,2.41, height 1.2

## Part data
C1 C7 C11 C12: library part C1608X5R1E475M080AC, "CAP CER 4.7UF 25V X5R 0603", Case/Package=0603, Case Code (Metric)=1608, Dielectric=X5R, Dielectric Material=Ceramic, Manufacturer=TDK, Max Operating Temperature=85°C, Min Operating Temperature=-55°C, Package Quantity=1, Supplier Part Number 1=810-C1608X5R1E475M, Tolerance=20%, Voltage Rating=25V, Capacitance=4.7uF, Case Code (Imperial)=0603, ComponentLink1Description=http://www.yageo.com/NewPortal/_en/search/productDocs.jsp?YageoPartNumber=AC0603JRNPO0BN470&src-supplier=Digi-Key, ComponentLink1URL=http://www.yageo.com/NewPortal/_en/search/productDocs.jsp?YageoPartNumber=AC0603JRNPO0BN470&src-supplier=Digi-Key, ComponentLink2Description=https://www.verical.com/server-webapp/html/getDatasheet?partID=726745&src-supplier=Verical, ComponentLink2URL=https://www.verical.com/server-webapp/html/getDatasheet?partID=726745&src-supplier=Verical, Composition=Ceramic, Depth=0.8mm, Height=0.8mm, Lead Free="Lead Free", Length=1.6mm, Manufacturer Part Number=C1608X5R1E475M080AC, Mount="Surface Mount", Packaging="Tape and Reel", Pricing 1="1=0.29, 10=0.237, 100=0.142, 500=0.106, 1000=0.09, 4000=0.076, 8000=0.072, 24000=0.07, 48000=0.067 (USD)", Radiation Hardening=No, REACH SVHC="No SVHC", Stock 1=40236, Supplier 1=Mouser, Termination=SMD/SMT, Thickness=0.039inch, Voltage Rating (DC)=25V, Weight=7.1E-05oz, Width=0.031inch
C2 C16 C22 C29 C31 C33 C34: library part CC0603KRX5R8BB105, "CAP CER 1UF 25V X5R 0603", Case/Package=0603, Case Code (Metric)=1608, Dielectric=X5R, Manufacturer=Yageo, Max Operating Temperature=85°C, Min Operating Temperature=-55°C, Package Quantity=1, Supplier Part Number 1=311-1445-1-ND, Tolerance=10%, Voltage Rating=25V, Capacitance=1uF, Case Code (Imperial)=0603, ComponentLink1Description=http://www.yageo.com/documents/recent/UPY-GPHC_X5R_4V-to-50V_25.pdf?src-supplier=Digi-Key, ComponentLink1URL=http://www.yageo.com/documents/recent/UPY-GPHC_X5R_4V-to-50V_25.pdf?src-supplier=Digi-Key, ComponentLink2Description=http://www.yageo.com/documents/recent/UPY-GPHC_X5R_4V-to-50V_12.pdf?src-supplier=Avnet+Europe, ComponentLink2URL=http://www.yageo.com/documents/recent/UPY-GPHC_X5R_4V-to-50V_12.pdf?src-supplier=Avnet+Europe, ComponentLink3Description=http://www.farnell.com/datasheets/1525783.pdf?src-supplier=Element14, ComponentLink3URL=http://www.farnell.com/datasheets/1525783.pdf?src-supplier=Element14, ComponentLink4Description=http://www.yageo.com/documents/recent/UPY-GPHC_X5R_4V-to-50V_12.pdf?src-supplier=Avnet, ComponentLink4URL=http://www.yageo.com/documents/recent/UPY-GPHC_X5R_4V-to-50V_12.pdf?src-supplier=Avnet, Depth=0.8mm, Halogen Free="Halogen Free", Height=0.8mm, Lead Free="Lead Free", Length=1.6mm, Manufacturer Part Number=CC0603KRX5R8BB105, Mount="Surface Mount", Number of Pins=2, Packaging="Tape and Reel", Pricing 1="1=0.1, 10=0.076, 100=0.0337, 500=0.0241, 1000=0.01894 (USD)", Radiation Hardening=No, REACH SVHC="No SVHC", Stock 1=459947, Supplier 1=Digi-Key, Termination=SMD/SMT, Thickness=0.035inch, Voltage Rating (DC)=25V, Width=0.031inch
C3 C5 C8 C9 C10 C13 C14 C15 C21 C40 C49 C52 C58 C60 C63 C64 C77 C78 C79 C80 C81 C82 C85 C88 C91: library part GRM033C81E104KE14D, "CAP CER 0.1UF 25V X6S 0201", Capacitance=100nF, Case/Package=0201, Case Code (Metric)=0603, Dielectric=X6S, Manufacturer=Murata, Max Operating Temperature=105°C, Min Operating Temperature=-55°C, Package Quantity=15000, Supplier Part Number 1=490-10403-1-ND, Tolerance=10%, Voltage Rating=25V, Case Code (Imperial)=0201, Category="Ceramic Capacitors", ComponentLink1Description=http://www.mouser.com/ds/2/281/c02e-2905.pdf?src-supplier=Mouser, ComponentLink1URL=http://www.mouser.com/ds/2/281/c02e-2905.pdf?src-supplier=Mouser, ComponentLink2Description=http://www.farnell.com/datasheets/2722733.pdf?src-supplier=Farnell, ComponentLink2URL=http://www.farnell.com/datasheets/2722733.pdf?src-supplier=Farnell, ComponentLink3Description=http://search.murata.co.jp/Ceramy/image/img/A01X/G101/ENG/GRM033C81E104KE14-01.pdf?src-supplier=Digi-Key, ComponentLink3URL=http://search.murata.co.jp/Ceramy/image/img/A01X/G101/ENG/GRM033C81E104KE14-01.pdf?src-supplier=Digi-Key, Height=0.3mm, Length=0.024inch, Manufacturer Part Number=GRM033C81E104KE14D, Mount="Surface Mount", Packaging="Tape and Reel", Pricing 1="1=0.10000, 10=0.05100, 50=0.02780, 100=0.02260, 500=0.01616, 1000=0.01270, 2500=0.01155, 5000=0.01063 (USD)", RoHS=Yes, RoHS Compliant=Yes, Stock 1=91, Supplier 1=Digi-Key, Termination=SMD/SMT, Thickness=0.013inch, Voltage Rating (DC)=25V, Weight=1.2E-05oz, Width=0.3mm
C4 C6 C17 C27 C30 C32 C35 C53 C57 C59 C61 C62 C89: library part GRM188R6YA106MA73D, "CAP CER 10UF 35V X5R 0603", Case/Package=0603, Case Code (Metric)=1608, Dielectric=X5R, Manufacturer=Murata, Max Operating Temperature=85°C, Min Operating Temperature=-55°C, Supplier Part Number 1=490-13248-6-ND, Tolerance=20%, Voltage Rating=35V, Capacitance=10uF, Case Code (Imperial)=0603, ComponentLink1Description=http://search.murata.co.jp/Ceramy/image/img/A01X/G101/ENG/GRM188R6YA106MA73-01.pdf?src-supplier=Digi-Key, ComponentLink1URL=http://search.murata.co.jp/Ceramy/image/img/A01X/G101/ENG/GRM188R6YA106MA73-01.pdf?src-supplier=Digi-Key, ComponentLink2Description=http://search.murata.co.jp/Ceramy/image/img/A01X/G101/ENG/GRM188R6YA106MA73-01.pdf?src-supplier=Mouser, ComponentLink2URL=http://search.murata.co.jp/Ceramy/image/img/A01X/G101/ENG/GRM188R6YA106MA73-01.pdf?src-supplier=Mouser, ComponentLink3Description=https://www.murata.com/~/media/webrenewal/support/library/catalog/products/capacitor/mlcc/c02e.ashx?la=en-us&src-supplier=Digi-Key, ComponentLink3URL=https://www.murata.com/~/media/webrenewal/support/library/catalog/products/capacitor/mlcc/c02e.ashx?la=en-us&src-supplier=Digi-Key, ComponentLink4Description=http://search.murata.co.jp/Ceramy/image/img/A01X/G101/ENG/GRM188R6YA106MA73-01.pdf?src-supplier=Future+Electronics, ComponentLink4URL=http://search.murata.co.jp/Ceramy/image/img/A01X/G101/ENG/GRM188R6YA106MA73-01.pdf?src-supplier=Future+Electronics, ComponentLink5Description=http://search.murata.co.jp/Ceramy/image/img/A01X/G101/ENG/GRM188R6YA106MA73-01.pdf?src-supplier=TTI, ComponentLink5URL=http://search.murata.co.jp/Ceramy/image/img/A01X/G101/ENG/GRM188R6YA106MA73-01.pdf?src-supplier=TTI, Length=0.063inch, Manufacturer Part Number=GRM188R6YA106MA73D, Mount="Surface Mount", Packaging="Tape and Reel", Pricing 1="1=0.5, 10=0.346, 100=0.2076, 500=0.1557, 1000=0.13148 (USD)", Stock 1=11640, Supplier 1=Digi-Key, Thickness=0.039inch, Voltage Rating (DC)=35V, Width=0.031inch
C18 C36 C37: "Capacitor", LatestRevisionDate=17-Jul-2002, LatestRevisionNote="Re-released for DXP Platform.", PackageDescription="Radial Cap, Thru-Hole; 2 Leads; 0.3 in Pin Spacing", PackageReference=RAD-0.3, Published=8-Jun-2000, Publisher="Altium Limited"
C19 C20: library part CC0603BRNPO9BN1R2, "CAP 1.2pF 50V, 0603", Case/Package=0603, Case Code (Metric)=1608, Dielectric=C0G, Manufacturer=Yageo, Max Operating Temperature=125°C, Min Operating Temperature=-55°C, Package Quantity=4000, Resistor Type=Ceramic, Supplier Part Number 1=603-CC603BRNPO9BN1R2, Voltage Rating=50V, Capacitance=1.2pF, Case Code (Imperial)=0603, Category="Ceramic Capacitors", ComponentLink1Description=https://datasheet.ciiva.com/26862/getdatasheetpartid-403487-26862671.pdf?src-supplier=Verical, ComponentLink1URL=https://datasheet.ciiva.com/26862/getdatasheetpartid-403487-26862671.pdf?src-supplier=Verical, ComponentLink2Description=https://datasheet.ciiva.com/13210/upy-gp-np0-16v-to-50v-8-13210853.pdf?src-supplier=Mouser, ComponentLink2URL=https://datasheet.ciiva.com/13210/upy-gp-np0-16v-to-50v-8-13210853.pdf?src-supplier=Mouser, ComponentLink3Description=https://datasheet.ciiva.com/11586/upy-gp-np0-16v-to-50v-8-11586536.pdf?src-supplier=Avnet, ComponentLink3URL=https://datasheet.ciiva.com/11586/upy-gp-np0-16v-to-50v-8-11586536.pdf?src-supplier=Avnet, ComponentLink4Description=https://datasheet.ciiva.com/17437/upy-gp-np0-16v-to-50v-8-17437548.pdf?src-supplier=Avnet+Europe, ComponentLink4URL=https://datasheet.ciiva.com/17437/upy-gp-np0-16v-to-50v-8-17437548.pdf?src-supplier=Avnet+Europe, Depth=0.8mm, Lead Free="Lead Free", Length=1.6mm, Manufacturer Part Number=CC0603BRNPO9BN1R2, Mount="Surface Mount", Packaging="Tape and Reel", Pricing 1="1=0.14000, 10=0.08500, 50=0.08500, 100=0.03800, 1000=0.02100, 10000=0.01500 (USD)", Radiation Hardening=No, RoHS=Yes, RoHS Compliant=Yes, Series=CC, Stock 1=8000, Supplier 1=Mouser, Termination=SMD/SMT, Thickness=0.035inch, Voltage Rating (DC)=50V, Width=0.031inch
C23 C24 C25 C26 C50: library part 593D107X9016D2TE3, "CAP TANT 100UF 10% 16V 2917", Case/Package=2917, Case Code (Metric)=7343, ESR (Equivalent Series Resistance)=125mR, Leakage Current=16uA, Manufacturer="Vishay Sprague", Max Operating Temperature=125°C, Min Operating Temperature=-55°C, Package Quantity=1, Ripple Current=1.1mA, Supplier Part Number 1=718-1102-1-ND, Tolerance=20%, Voltage=16V, Capacitance=100uF, Case Code (Imperial)=2917, ComponentLink1Description=http://www.vishay.com/docs/40005/593d.pdf?src-supplier=Avnet, ComponentLink1URL=http://www.vishay.com/docs/40005/593d.pdf?src-supplier=Avnet, ComponentLink2Description=http://documents.rs-components.com/techlib://itc_doclist_GB.htm?stockno=6844477&src-supplier=RSComponents, ComponentLink2URL=http://documents.rs-components.com/techlib://itc_doclist_GB.htm?stockno=6844477&src-supplier=RSComponents, ComponentLink3Description=http://www.vishay.com/docs/40005/593d.pdf?src-supplier=Avnet+Europe, ComponentLink3URL=http://www.vishay.com/docs/40005/593d.pdf?src-supplier=Avnet+Europe, ComponentLink4Description=http://www.vishay.com/docs/40005/593d.pdf?src-supplier=Digi-Key, ComponentLink4URL=http://www.vishay.com/docs/40005/593d.pdf?src-supplier=Digi-Key, ComponentLink5Description=http://www.mouser.com/ds/2/427/593d-239975.pdf?src-supplier=Mouser, ComponentLink5URL=http://www.mouser.com/ds/2/427/593d-239975.pdf?src-supplier=Mouser, ComponentLink6Description=https://www.alliedelec.com/m/d/4999163682384315a74ef22064734d6b.pdf?src-supplier=Allied+Electronics, ComponentLink6URL=https://www.alliedelec.com/m/d/4999163682384315a74ef22064734d6b.pdf?src-supplier=Allied+Electronics, Depth=4.3mm, Dissipation Factor=8%, Features="General Purpose", Height=2.8mm, Height - Seated (Max)=0.122inch, Lead Free="Lead Free", Length=7.3mm, Manufacturer Part Number=593D107X9016D2TE3, Mount="Surface Mount,PCB", Number of Pins=2, Packaging="Tape and Reel", Polarity=Polar, Pricing 1="1=0.99, 10=0.783, 100=0.5874 (USD)", Radiation Hardening=No, REACH SVHC=Unknown, Stock 1=7834, Supplier 1=Digi-Key, Termination=SMD/SMT, Voltage Rating=16V, Voltage Rating (DC)=16V, Weight=0.023634oz, Width=0.169inch
C28 C51: library part C2012X5R1E226M125AC, "CAP CER 22UF 25V X5R 0805"
C38 C39 C54: library part GCM1555C1H101JA16D, "CAP CER 100PF 50V C0G/NP0 0402", Case/Package=0402, Case Code (Metric)=1005, Dielectric=C0G, Manufacturer=Murata, Max Operating Temperature=125°C, Min Operating Temperature=-55°C, Package Quantity=10000, Ratings=AEC-Q200, Supplier Part Number 1=490-10669-1-ND, Tolerance=5%, Voltage=50V, Capacitance=100pF, Case Code (Imperial)=0402, ComponentLink1Description=https://www.verical.com/server-webapp/html/getDatasheet?partID=748988&src-supplier=Verical, ComponentLink1URL=https://www.verical.com/server-webapp/html/getDatasheet?partID=748988&src-supplier=Verical, Depth=0.5mm, Height=0.5mm, Lead Free="Lead Free", Length=1mm, Manufacturer Part Number=GCM1555C1H101JA16D, Mount="Surface Mount", Packaging="Tape and Reel", Pricing 1="1=0.1, 10=0.068, 100=0.0303, 500=0.02166, 1000=0.01701, 2500=0.01547, 5000=0.01423 (USD)", Radiation Hardening=No, REACH SVHC="No SVHC", Stock 1=2688959, Supplier 1=Digi-Key, Termination=SMD/SMT, Thickness=0.022inch, Voltage Rating=50V, Voltage Rating (DC)=50V, Weight=0.000212oz, Width=0.02inch
C41: library part GRM155R71H103KA88J, "CAP CER 10000PF 50V X7R 0402", Case/Package=0402, Case Code (Metric)=1005, Dielectric=X7R, Manufacturer=Murata, Max Operating Temperature=125°C, Min Operating Temperature=-55°C, Package Quantity=50000, Supplier Part Number 1=490-6351-1-ND, Tolerance=10%, Voltage=50V, Capacitance=10nF, Case Code (Imperial)=0402, ComponentLink1Description=https://www.murata.com/~/media/webrenewal/support/library/catalog/products/capacitor/mlcc/c02e.ashx?la=en-us&src-supplier=Digi-Key, ComponentLink1URL=https://www.murata.com/~/media/webrenewal/support/library/catalog/products/capacitor/mlcc/c02e.ashx?la=en-us&src-supplier=Digi-Key, Depth=0.5mm, Height=0.5mm, Lead Free="Lead Free", Length=1mm, Manufacturer Part Number=GRM155R71H103KA88J, Mount="Surface Mount", Packaging="Tape and Reel", Pricing 1="1=0.1, 10=0.042, 100=0.0186, 500=0.01328, 1000=0.01044, 2500=0.00949, 5000=0.00873 (USD)", Radiation Hardening=No, Stock 1=2794495, Supplier 1=Digi-Key, Termination=SMD/SMT, Thickness=0.022inch, Voltage Rating=50V, Voltage Rating (DC)=50V, Width=0.02inch
C65 C66: library part GCM0335C1H180FA16D, "CAP CER 18PF 50V C0G/NP0 0201", Manufacturer=Murata, Supplier Part Number 1=490-GCM0335C1H180FA16DCT-ND, Category="Ceramic Capacitors", Manufacturer Part Number=GCM0335C1H180FA16D, Pricing 1="1=0.10000, 10=0.06500, 50=0.03560, 100=0.02910, 500=0.02076, 1000=0.01630, 2500=0.01482, 5000=0.01364 (USD)", RoHS=Yes, RoHS Compliant=Yes, Stock 1=7977, Supplier 1=Digi-Key
C83: library part GRM0335C1H100FA01D, "CAP CER 10PF 50V C0G/NP0 0201", Case/Package=0201, Case Code (Metric)=0603, Dielectric=C0G, Manufacturer=Murata, Max Operating Temperature=125°C, Min Operating Temperature=-55°C, Package Quantity=15000, Supplier Part Number 1=490-7750-1-ND, Tolerance=1%, Voltage Rating=50V, Capacitance=10pF, Case Code (Imperial)=0201, Category="Ceramic Capacitors", ComponentLink1Description=http://www.mouser.com/ds/2/281/c02e-2905.pdf?src-supplier=Mouser, ComponentLink1URL=http://www.mouser.com/ds/2/281/c02e-2905.pdf?src-supplier=Mouser, ComponentLink2Description=http://search.murata.co.jp/Ceramy/image/img/A01X/G101/ENG/GRM0335C1H100FA01-01.pdf?src-supplier=Digi-Key, ComponentLink2URL=http://search.murata.co.jp/Ceramy/image/img/A01X/G101/ENG/GRM0335C1H100FA01-01.pdf?src-supplier=Digi-Key, Height=0.3mm, Lead Free="Lead Free", Length=0.024inch, Manufacturer Part Number=GRM0335C1H100FA01D, Mount="Surface Mount", Packaging="Tape and Reel", Pricing 1="1=0.10000, 10=0.01900, 50=0.01060, 100=0.00860, 500=0.00616, 1000=0.00484, 2500=0.00440, 5000=0.00405 (USD)", RoHS=Yes, Stock 1=317364, Supplier 1=Digi-Key, Termination=SMD/SMT, Thickness=0.013inch, Voltage Rating (DC)=50V, Width=0.012inch